# Altium PCB Acoustics Board.PcbDoc (part 1 of 3)
Units mil, origin at the board's own origin, x right, y up, seen from the top; angles counter-clockwise.
Board outline 4100 x 5000 mil, 4 copper layers (Top Layer, Middle 1 Layer, Middle 2 Layer, Bottom Layer), stack 53.912 mil thick; 240 components, 165 nets, 793 pads, 573 vias.
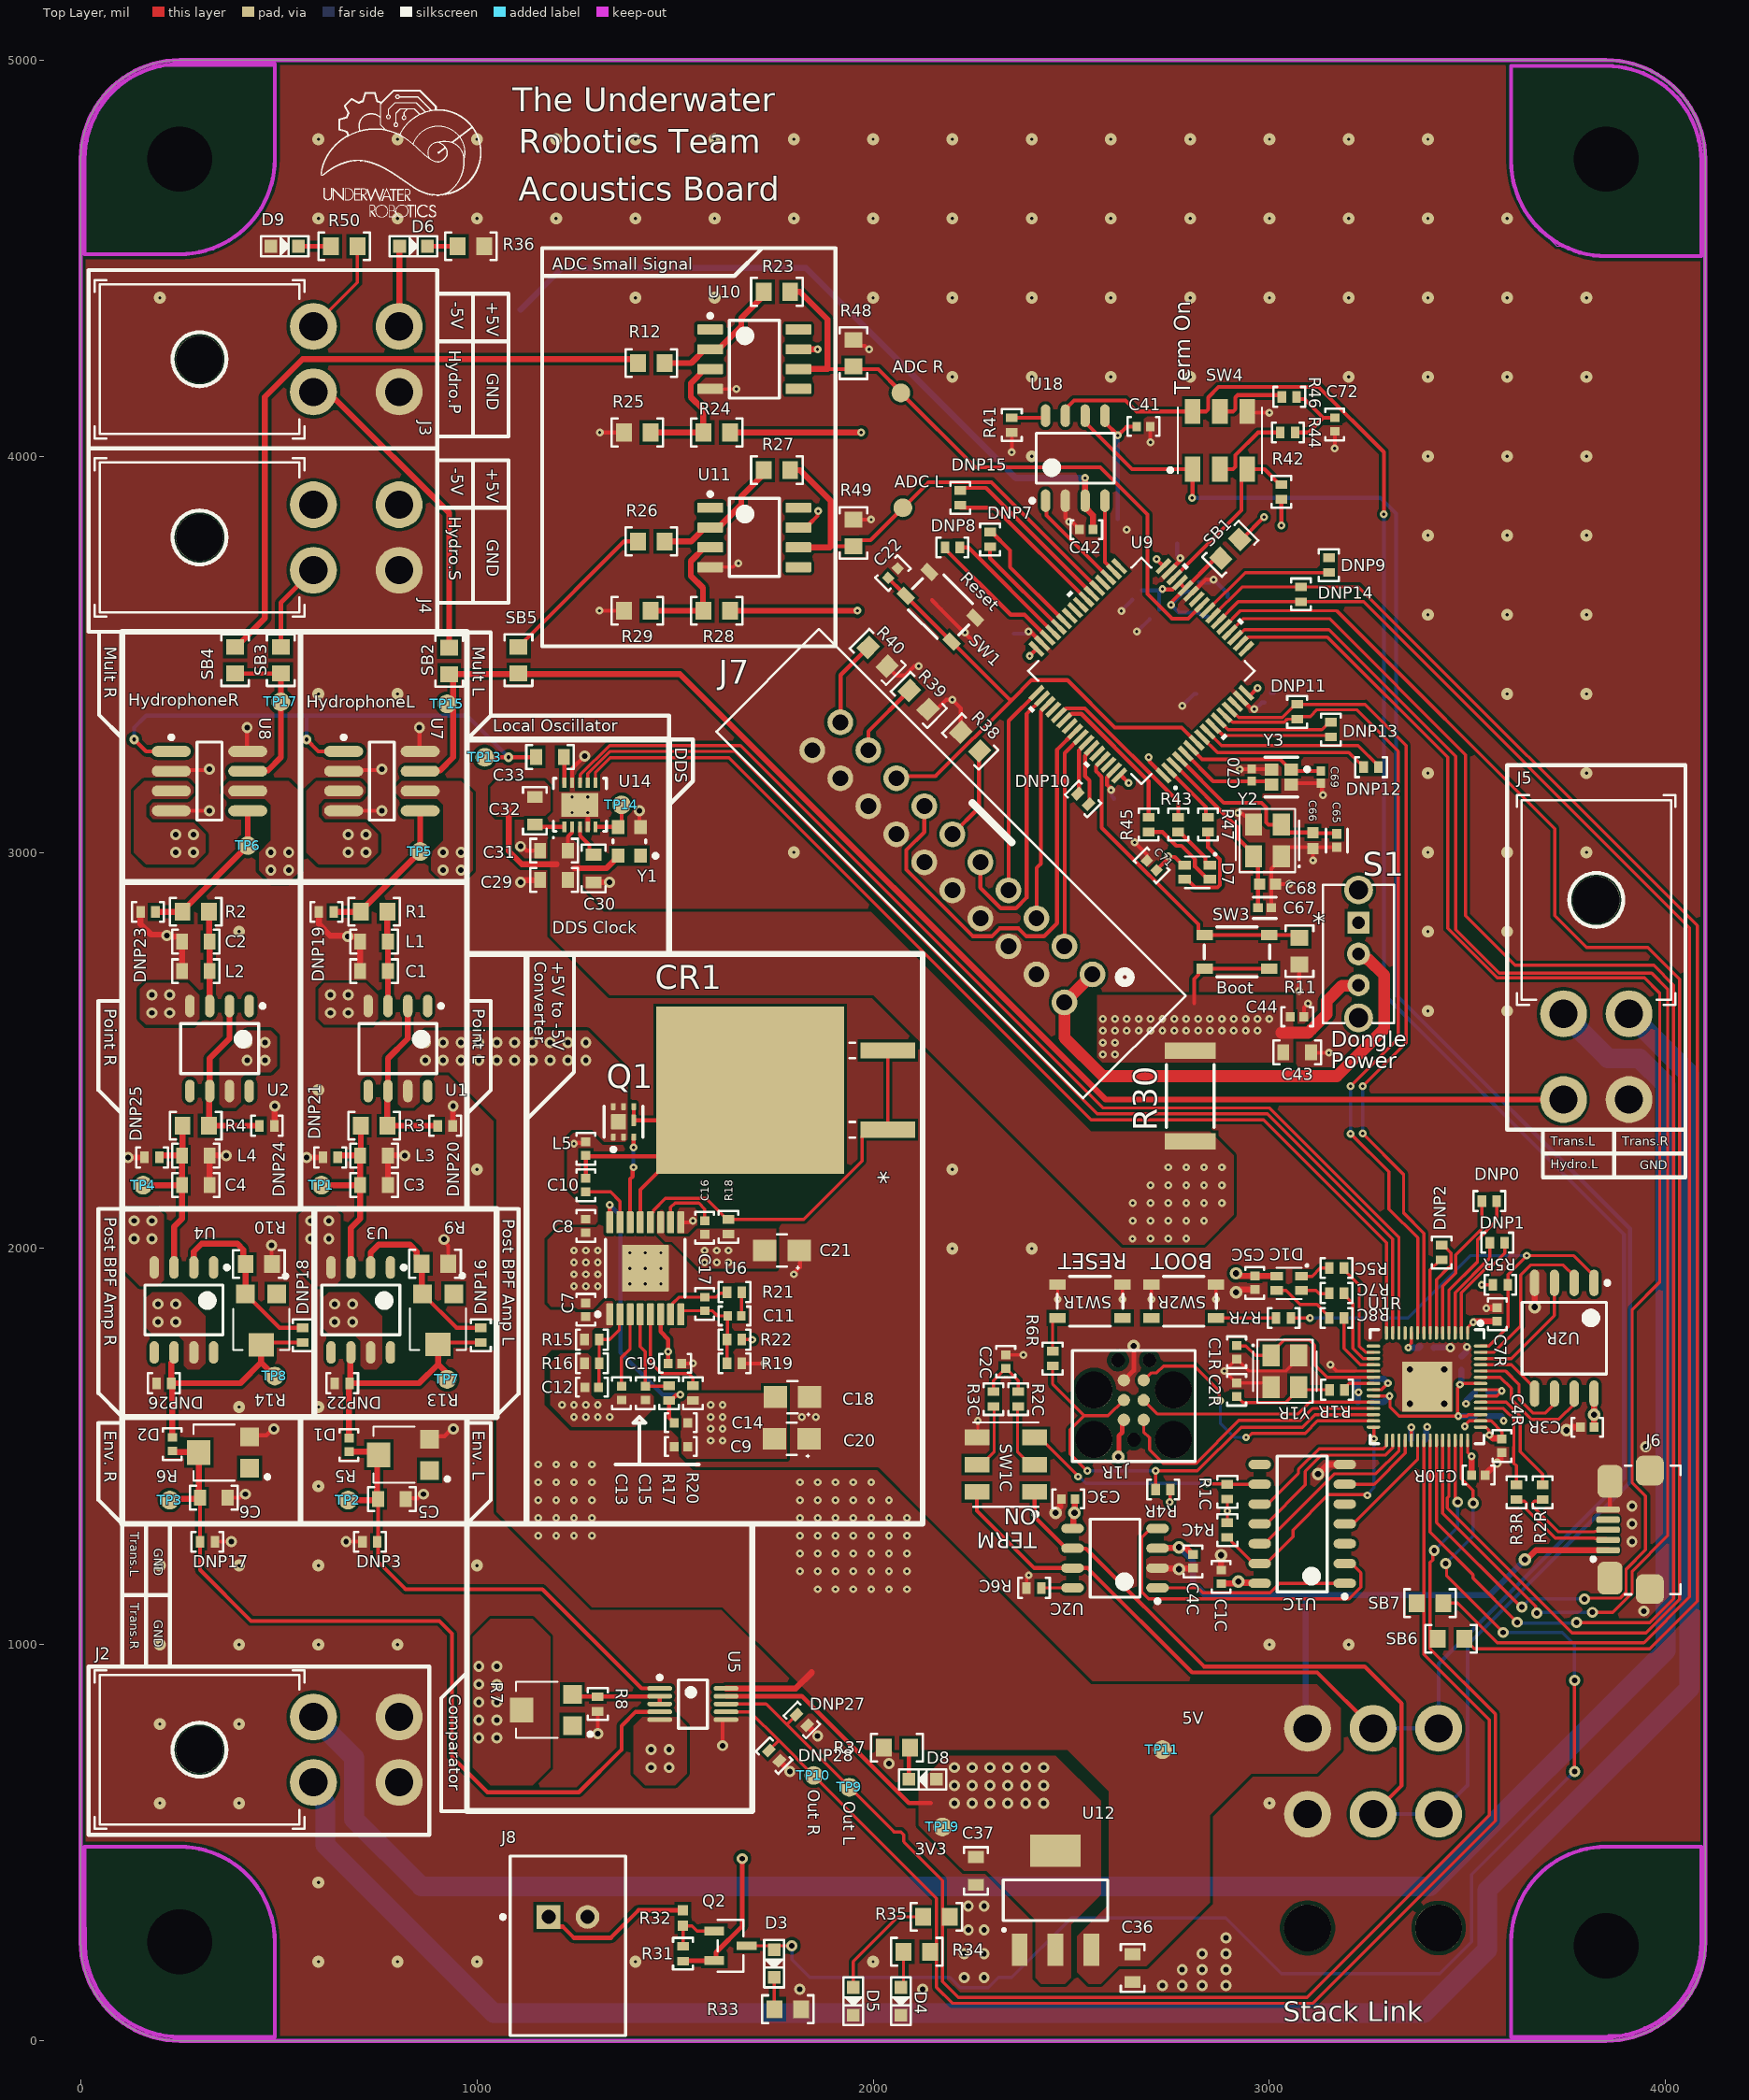
[diagram p0: Top Layer view]
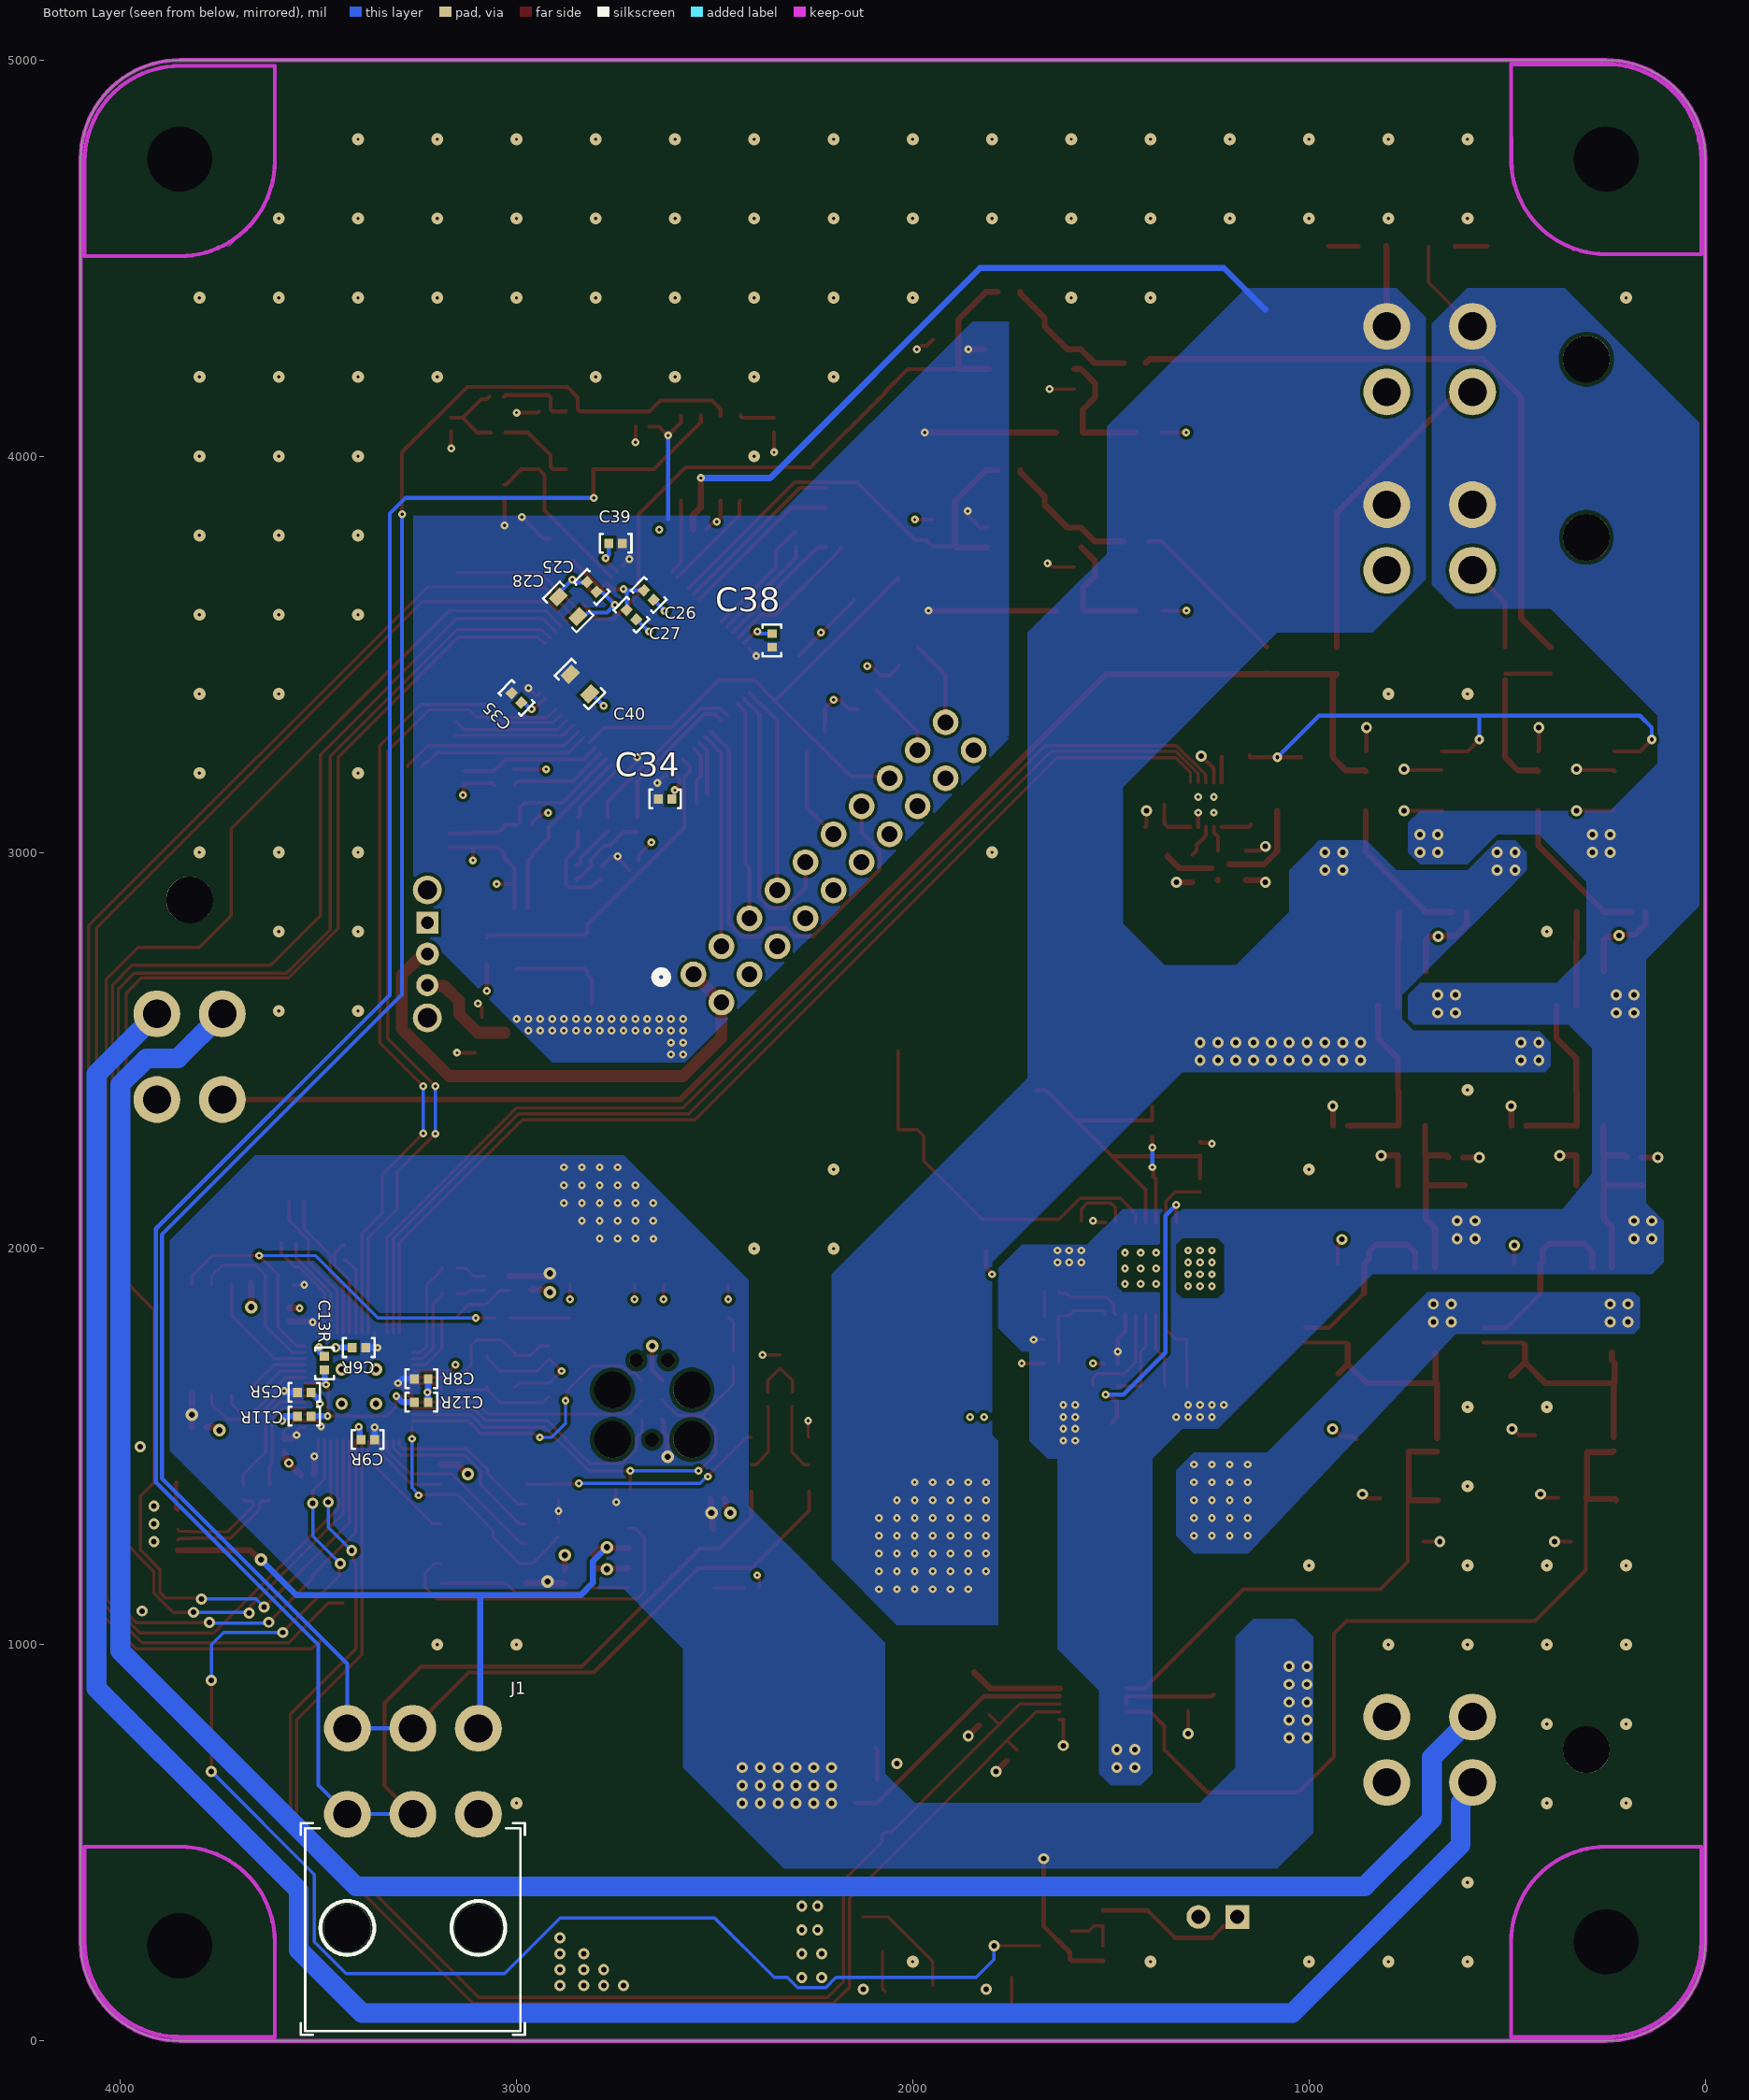
[diagram p1: Bottom Layer view, seen from below]
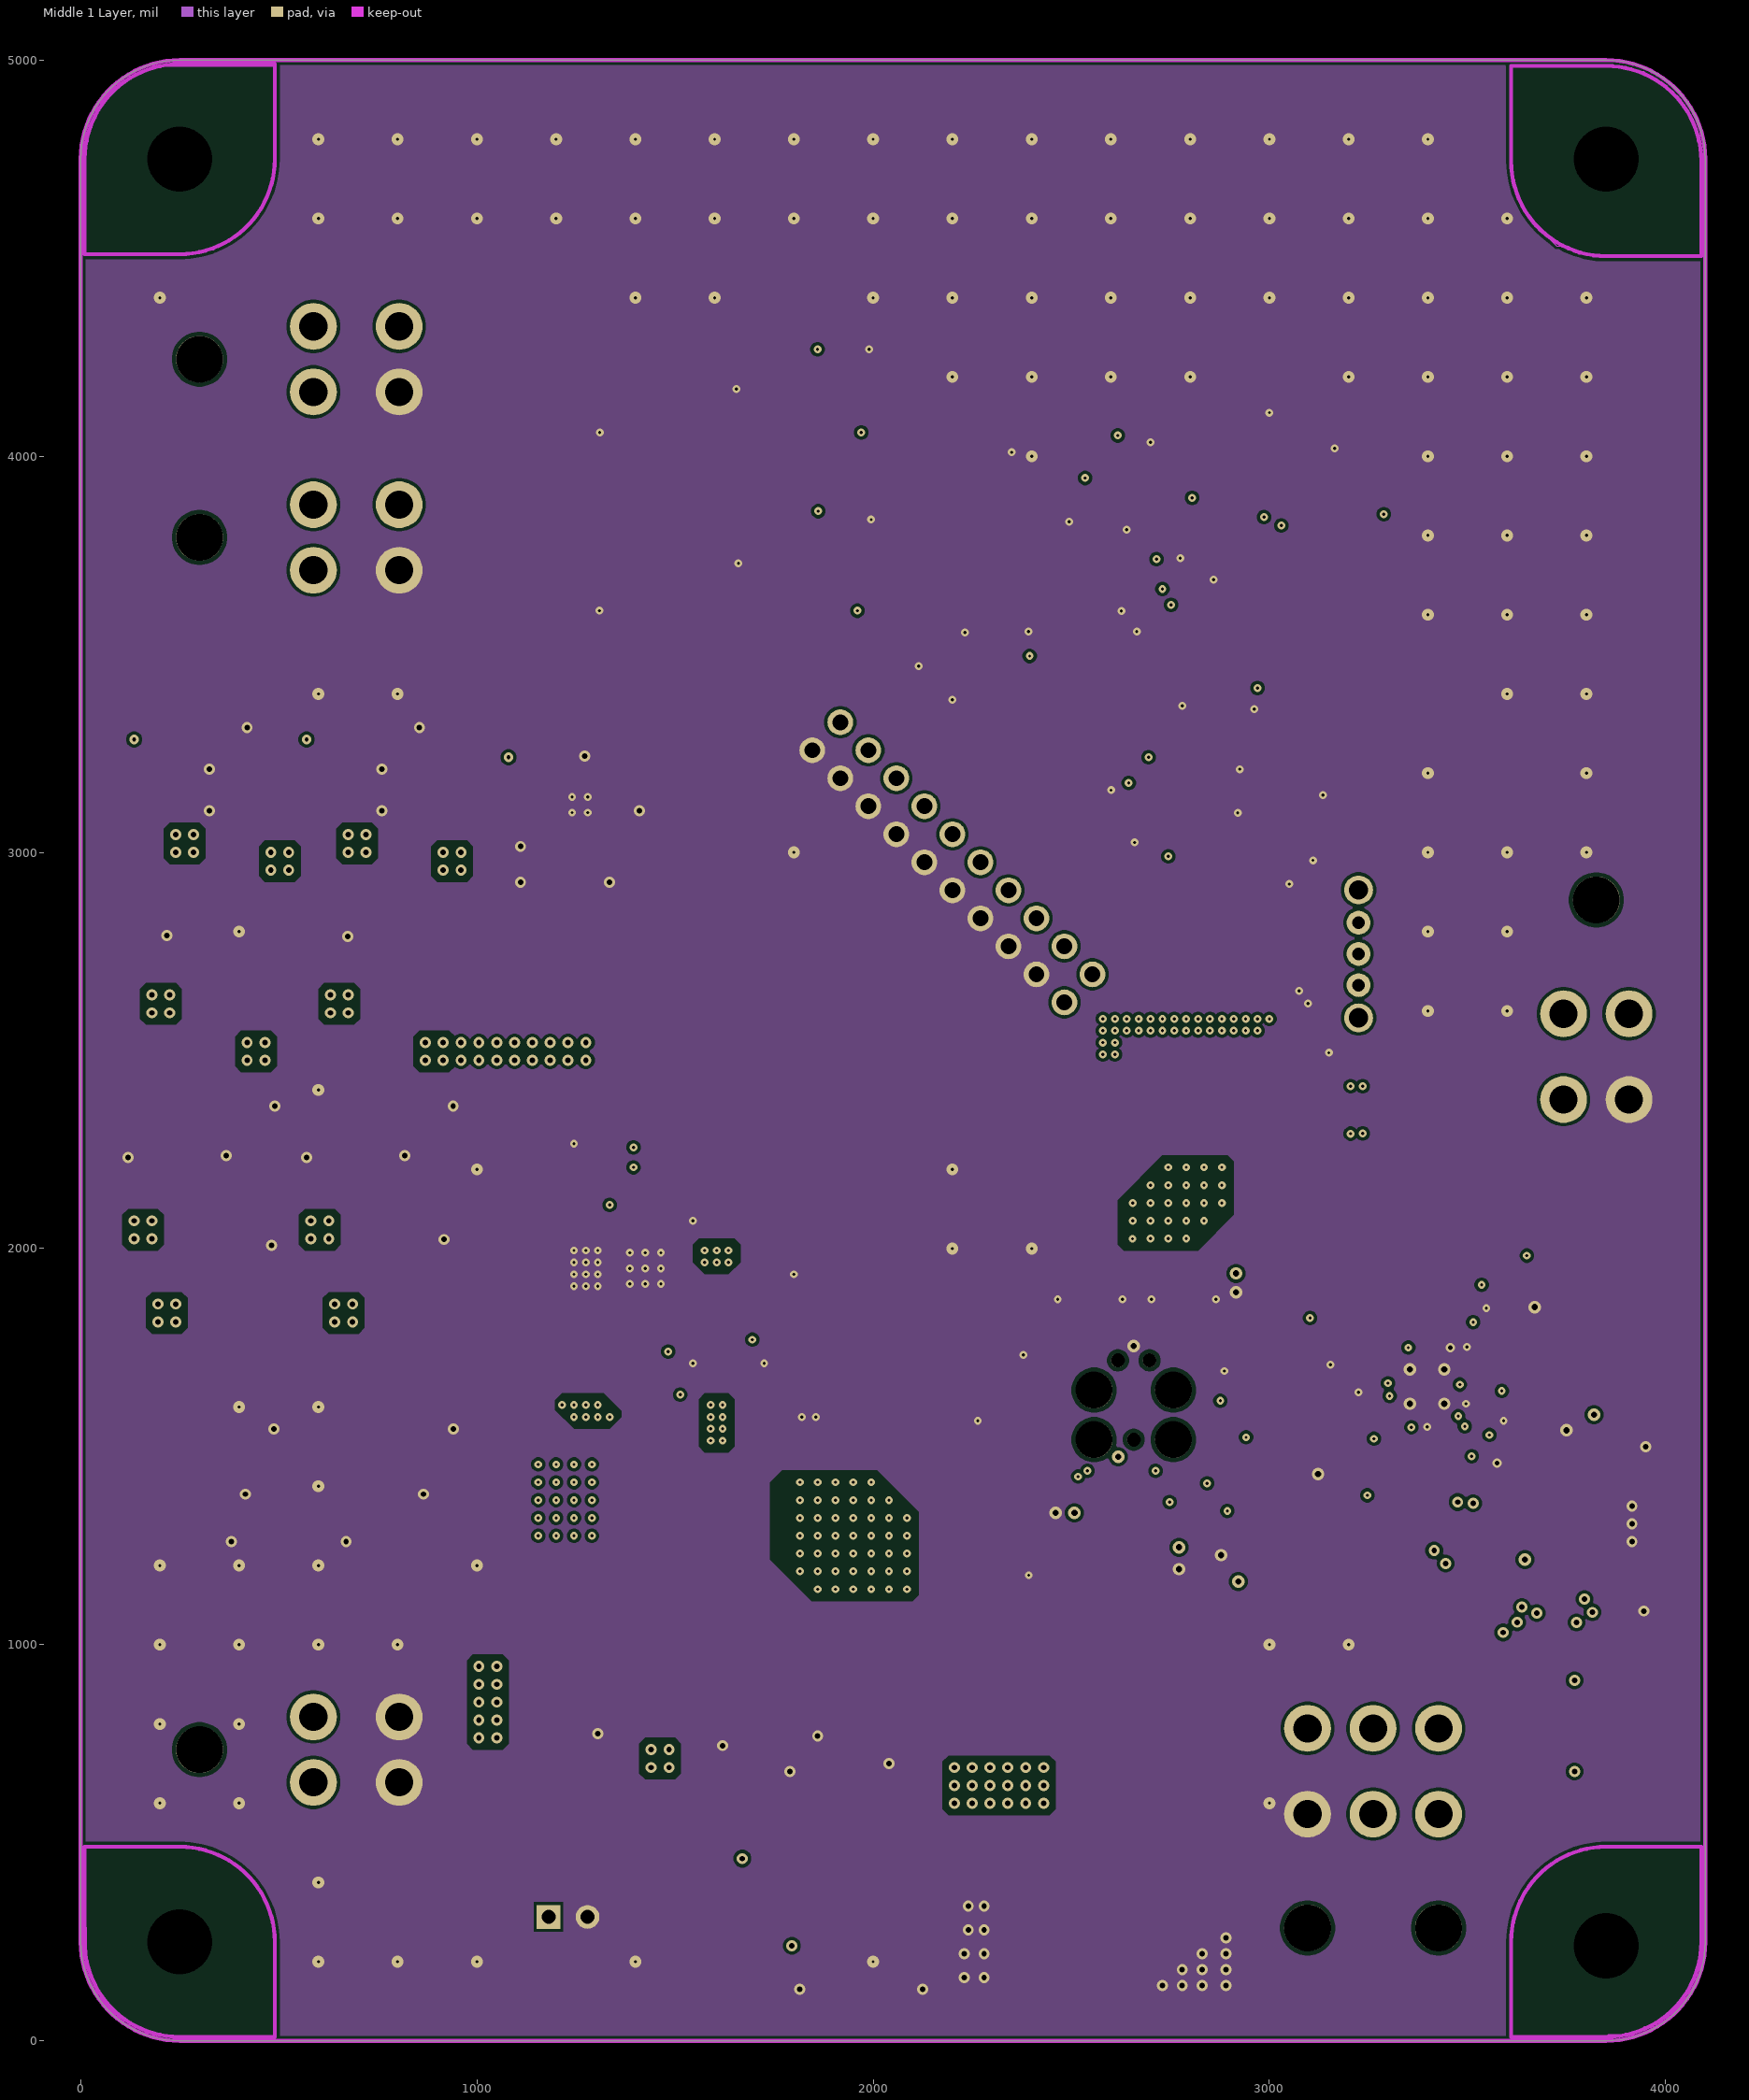
[diagram p2: Middle 1 Layer]
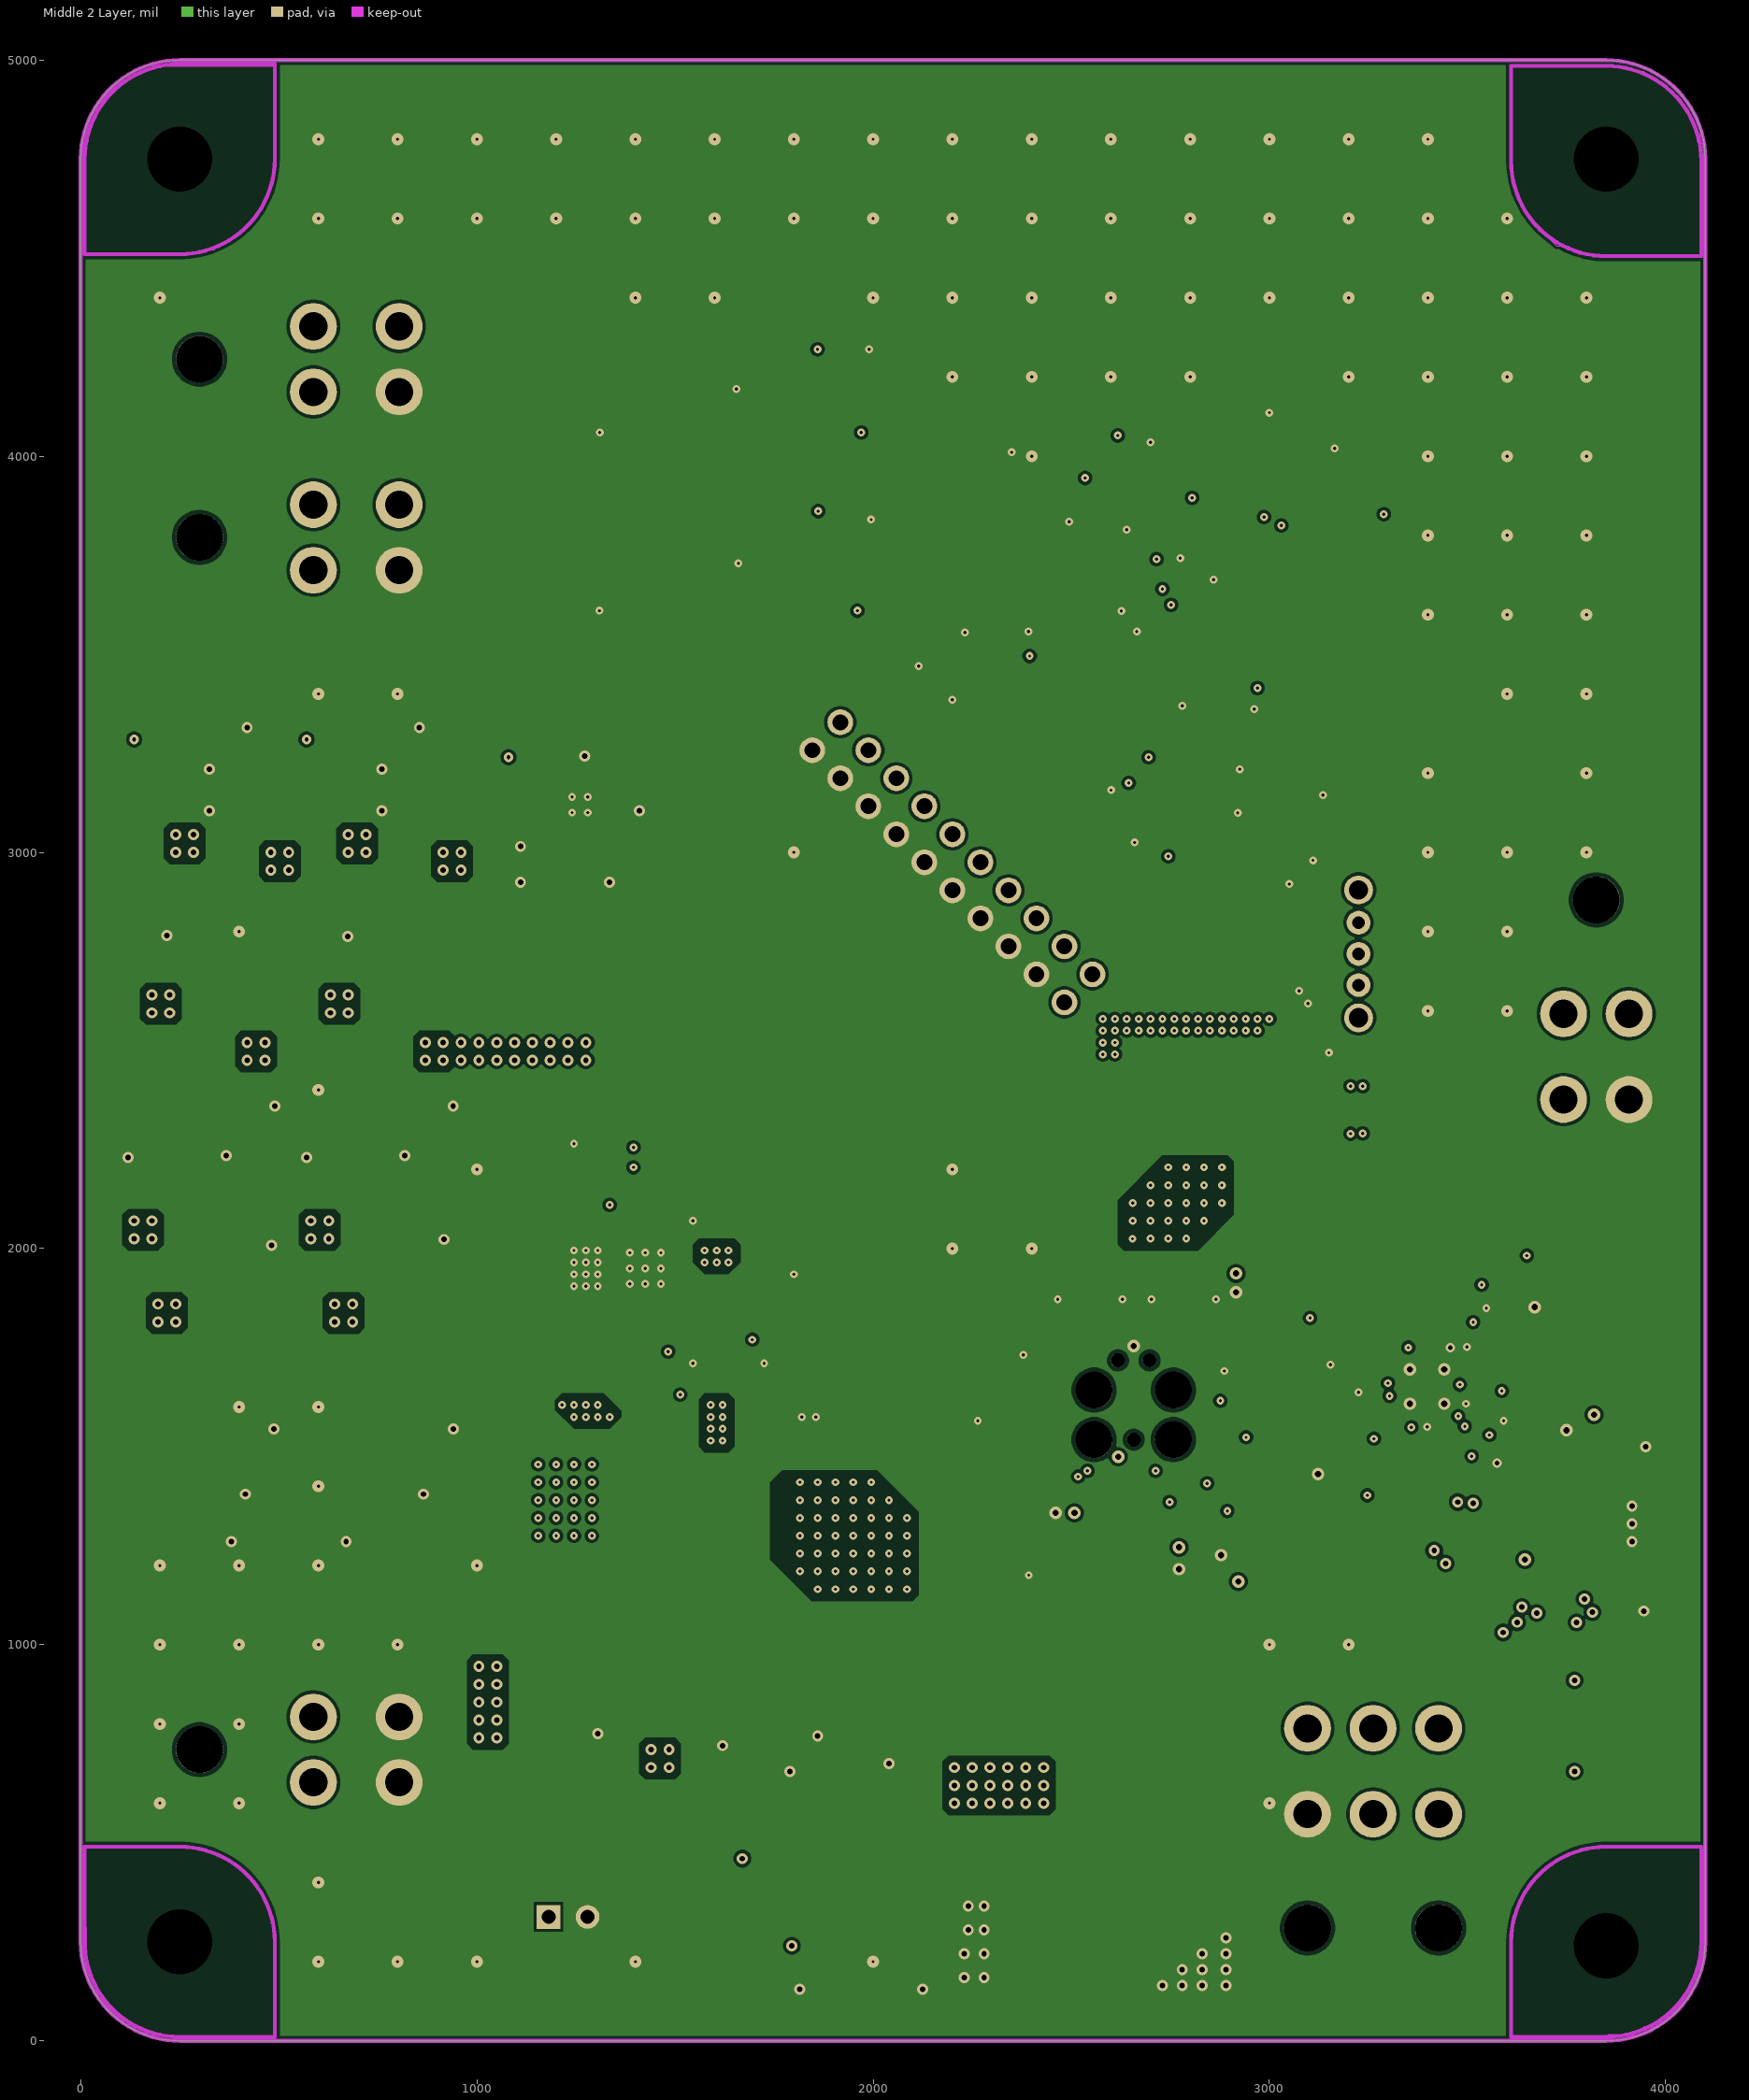
[diagram p3: Middle 2 Layer]
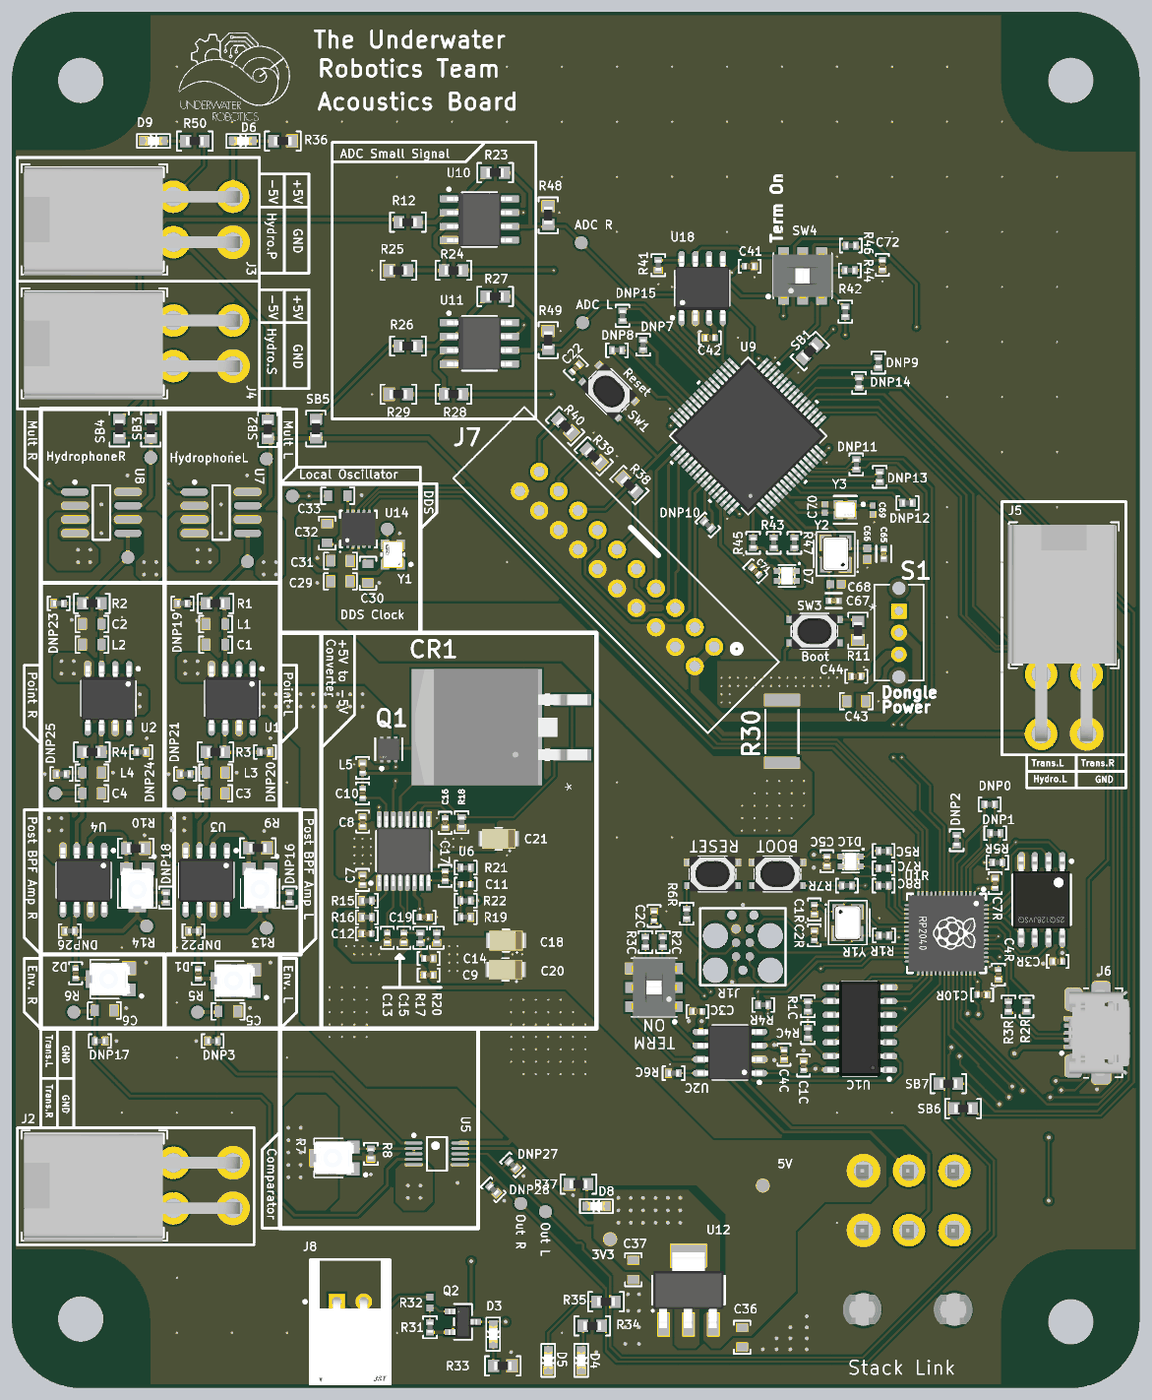
[diagram p6: 3D render of the assembled board from above, using the file's embedded part models]
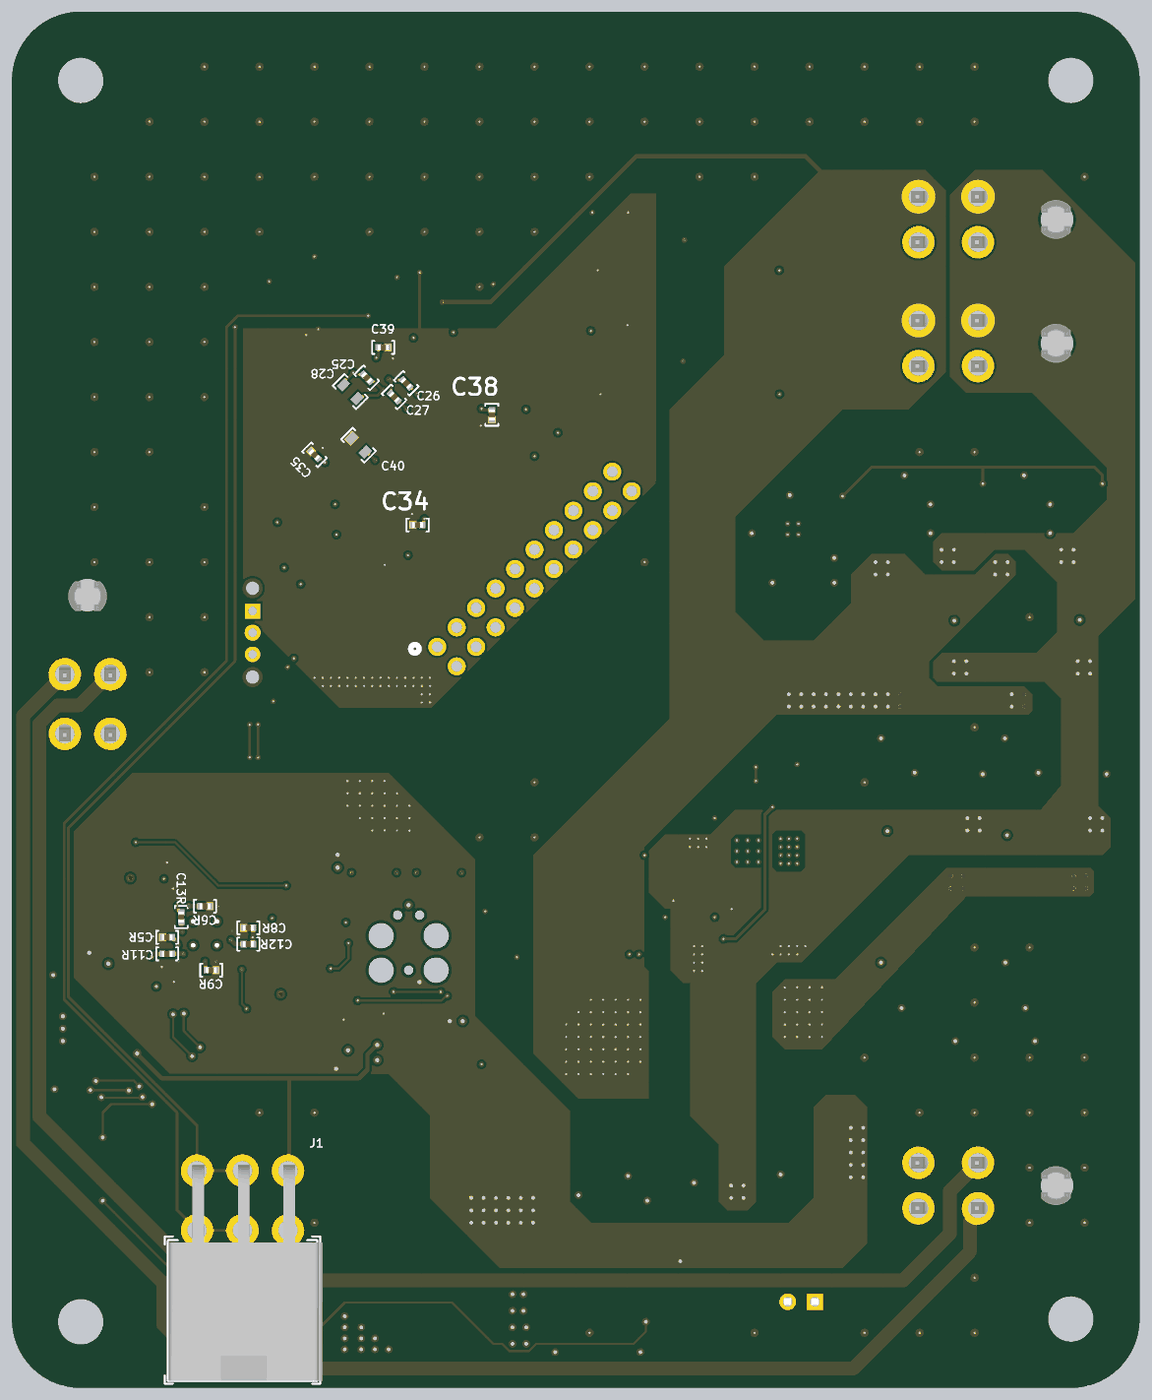
[diagram p7: 3D render of the assembled board from below, using the file's embedded part models]

## Layer stack, top to bottom
Top Solder: solder mask 1, SM-001, Dk 4
Top Layer: signal copper 1.378
Dielectric 1: prepreg 5.1, PP-017, Dk 4.3
Dielectric 2: prepreg 5.1, PP-017, Dk 4.3
Middle 1 Layer: signal copper 1.378
Dielectric 3: core 28, Core-039, Dk 4.8
Middle 2 Layer: signal copper 1.378
Dielectric 4: prepreg 5.1, PP-017, Dk 4.3
Dielectric 5: prepreg 5.1, PP-017, Dk 4.3
Bottom Layer: signal copper 1.378
Bottom Solder: solder mask 1, SM-001, Dk 4

## Board outline
250,0 cw(c250,250) 0,250 0,4750 cw(c250,4750) 250,5000 3850,5000 cw(c3850,4750) 4100,4750 4100,250 cw(c3850,250) 3850,0

## Design rules (kind name [scope] priority, off if disabled: settings)
AcuteAngle [All] p1: minimum=6.00000000000000E+0001 checktracksonly=FALSE
BoardOutlineClearance "BoardOutlineClearance JLCPCB" [All] p1: gap=7.87 ignorepadtopadclearanceinfootprint=FALSE
Clearance "Clearance JLCPCB 4 layer" [All] p1: gap=7.87 ignorepadtopadclearanceinfootprint=FALSE except(3.54: Arc-Arc Arc-Track Track-Track; 5: Arc-SMDPad Track-SMDPad SMDPad-SMDPad; 10: Arc-Hole Track-Hole SMDPad-Hole THPad-Hole Via-Hole Fill-Hole Poly-Hole Region-Hole Text-Hole)
DiffPairsRouting [All] p1: maxlimit=10 minlimit=6 mostfreqgap=8 toplayer_minwidth=3.54 toplayer_maxwidth=15 toplayer_prefwidth=8 midlayer1_minwidth=3.54 midlayer1_maxwidth=15 midlayer1_prefwidth=8 midlayer2_minwidth=3.54 midlayer2_maxwidth=15 midlayer2_prefwidth=8 bottomlayer_minwidth=3.54 bottomlayer_maxwidth=15 bottomlayer_prefwidth=8 maxuncoupledlength=500
HoleSize "HoleSize JLCPCB Pad" [IsPad] p1: absolutevalues=TRUE maxlimit=248.03 minlimit=19.68 maxpercent=80.000 minpercent=20.000
HoleSize "HoleSize JLCPCB 4 layer" [All] p2: absolutevalues=TRUE maxlimit=248.03 minlimit=7.87 maxpercent=80.000 minpercent=20.000
HoleToHoleClearance "HoleToHoleClearance JLCPCB" [All] p1: gap=10 allowstackedmicrovias=TRUE
MinimumAnnularRing "MinimumAnnularRing JLCPCB Pad" [IsPad] p1: minimumring=11.81
MinimumAnnularRing "MinimumAnnularRing JLCPCB 1oz" [All] p2: minimumring=5.12
MinimumSolderMaskSliver [All] p1: minsoldermaskwidth=1
PlaneConnect [All] p1: pad.planeconnectstyle=Relief pad.reliefexpansion=20 pad.reliefentries=4 pad.reliefconductorwidth=10 pad.reliefairgap=10 via.planeconnectstyle=Direct via.reliefexpansion=20 via.reliefentries=4 via.reliefconductorwidth=10 via.reliefairgap=10
PolygonConnect [All] p1: connectstyle=Direct reliefconductorwidth=15 reliefentries=4 polygonreliefangle="45 Angle" airgapwidth=10
RoutingVias "RoutingVias JLCPCB 4 layer" [All] p1: holewidth=19.68 width=39.37 viastyle="Through Hole" minholewidth=7.87 minwidth=15.75 maxholewidth=50 maxwidth=80
SilkToSilkClearance [All] p1: silktosilkclearance=3
SilkToSolderMaskClearance "SilkToSolderMaskClearance JLCPCB" [IsPad] p1: minsilkscreentomaskgap=5.91 clearancetoexposedcopper=TRUE
SolderMaskExpansion "SolderMaskExpansion JLCPCB" [All] p1: expansion=1.97 istentingtop=FALSE
SupplyNets "Schematic Supply Nets_6" [InNet('3V3_STM32')] p1: voltage=0.000
SupplyNets "Schematic Supply Nets_5" [InNet('3V3')] p2: voltage=0.000
SupplyNets "Schematic Supply Nets_2" [InNet('GND')] p3: voltage=0.000
SupplyNets "Schematic Supply Nets_1" [InNet('-5V')] p4: voltage=0.000
SupplyNets "Schematic Supply Nets" [InNet('5V')] p5: voltage=0.000
Width "Width JLCPCB 4 layer" [All] p1: maxlimit=196.85 minlimit=3.54 preferedwidth=9.84 minimp=50.000000 maximp=50.000000 favimp=50.000000
23 further rules are at their usual default settings.

## Classes and differential pairs
differential pair class "USB 2.0": USB USB_RP2040
component class STM32: C22 C25 C26 C27 C28 C34 C35 C38 C39 C40 C41 C42 C43 C44 C65 C66 C67 C68 C69 C70 C71 C72 D7 DNP7 DNP8 DNP9 DNP10 DNP11 DNP12 DNP13 DNP14 DNP15 J7 R11 R30 R38 R39 R40 R41 R42 R43 R44 R45 R46 R47 S1 SB1 SW1 SW3 SW4 U9 U18 Y2 Y3
component class "Process Sheet": C1 C2 C3 C4 C5 C6 D1 D2 DNP3 DNP16 DNP17 DNP18 DNP19 DNP20 DNP21 DNP22 DNP23 DNP24 DNP25 DNP26 DNP27 DNP28 L1 L2 L3 L4 R1 R2 R3 R4 R5 R6 R7 R8 R9 R10 R13 R14 TP1 TP2 TP3 TP4 TP5 TP6 TP7 TP8 TP9 TP10 U1 U2 U3 U4 U5 U7 U8
component class "Power Sheet": C7 C8 C9 C10 C11 C12 C13 C14 C15 C16 C17 C18 C19 C20 C21 C36 C37 CR1 D6 D8 D9 L5 Q1 R15 R16 R17 R18 R19 R20 R21 R22 R36 R37 R50 TP11 TP19 U6 U12
component class U_RP2040_C: C1R C2R C3R C4R C5R C6R C7R C8R C9R C10R C11R C12R C13R J1R R1R R2R R3R R4R R5R R6R R7R SW1R SW2R U1R U2R Y1R
component class U_RP2040_with_CAN: C1C C2C C3C C4C C5C D1C R1C R2C R3C R4C R5C R6C R7C R8C SW1C U1C U2C
component class "[Acoustics] Connections & RP2040": "ADC L" "ADC R" C29 C30 C31 C32 C33 D3 D4 D5 DNP0 DNP1 DNP2 J1 J2 J3 J4 J5 J6 J8 Q2 R12 R23 R24 R25 R26 R27 R28 R29 R31 R32 R33 R34 R35 R48 R49 SB2 SB3 SB4 SB5 SB6 SB7 TP13 TP14 TP15 TP17 U10 U11 U14 Y1
differential pair USB: +USB_P -USB_N
differential pair USB_RP2040: +USB_RP2040_P -USB_RP2040_N

## Components (designator, comment, footprint, x,y, rotation, side; value= is the part's Value field where it differs from the comment)
"ADC L" "PCB Test Point" TESTPOINT_1.2MM 2075,3870 r0 top
"ADC R" "PCB Test Point" TESTPOINT_1.2MM 2070,4160 r0 top
C1 "27pF Ceramic 50V" CAPACITOR_0603 740.63,2700 r180 top value=27pF
C1C "100nF Ceramic 25V" CAPACITOR_0402 2878.15,1171.14 r90 top value=0.1uF
C1R "27pF Ceramic 50V" CAPACITOR_0402 2917.52,1738.07 r270 top value=27pF
C2 "27pF Ceramic 50V" CAPACITOR_0603 290.63,2775 r180 top value=27pF
C2C "4700pF Ceramic 25V" CAPACITOR_0402 2334.84,1714.45 r270 top value=4.7nF
C2R "27pF Ceramic 50V" CAPACITOR_0402 2917.52,1643.58 r90 top value=27pF
C3 "27pF Ceramic 50V" CAPACITOR_0603 740.63,2160 r0 top value=27pF
C3C "100nF Ceramic 25V" CAPACITOR_0402 2492.32,1367.99 r180 top value=0.1uF
C3R "100nF Ceramic 6.3V" CAPACITOR_0402 3802.17,1549.09 r180 top value=0.1uF
C4 "27pF Ceramic 50V" CAPACITOR_0603 290.63,2160 r0 top value=27pF
C4C "100nF Ceramic 25V" CAPACITOR_0402 2807.28,1210.51 r270 top value=0.1uF
C4R "1uF Ceramic 16V" CAPACITOR_0402 3586.81,1501.85 r270 top value=1uF
C5 "10uF Ceramic 6.3V" CAPACITOR_0603 785.54,1368.07 r0 top
C5C "1uF Ceramic 16V" CAPACITOR_0402 2963.11,1913.59 r270 top value=1uF
C5R "100nF Ceramic 6.3V" CAPACITOR_0402 3535.63,1636.95 r180 bottom value=0.1uF
C6 "10uF Ceramic 6.3V" CAPACITOR_0603 336.08,1371.25 r0 top
C6R "100nF Ceramic 6.3V" CAPACITOR_0402 3397.83,1749.88 r0 bottom value=0.1uF
C7 "1uF Ceramic 16V" CAPACITOR_0402 1274.91,1845.5 r90 top value="2.2 uF"
C7R "100nF Ceramic 6.3V" CAPACITOR_0402 3575,1833.8 r90 top value=0.1uF
C8 "1uF Ceramic 16V" CAPACITOR_0402 1275,2057.13 r270 top value="100 nF"
C8R "100nF Ceramic 6.3V" CAPACITOR_0402 3240.35,1671.25 r180 bottom value=0.1uF
C9 "1uF Ceramic 16V" CAPACITOR_0402 1515,1500 r0 top value=2.2uF
C9R "100nF Ceramic 6.3V" CAPACITOR_0402 3375.59,1517.6 r0 bottom value=0.1uF
C10 "1uF Ceramic 16V" CAPACITOR_0402 1275,2160 r270 top value=100nF
C10R "100nF Ceramic 6.3V" CAPACITOR_0402 3527.76,1428.29 r0 top value=0.1uF
C11 "1uF Ceramic 16V" CAPACITOR_0402 1650,1830 r0 top value=1.2nF
C11R "1uF Ceramic 16V" CAPACITOR_0402 3535.63,1576.65 r0 bottom value=1uF
C12 "1uF Ceramic 16V" CAPACITOR_0402 1290,1650 r180 top value="56 nF"
C12R "100nF Ceramic 6.3V" CAPACITOR_0402 3240.35,1612.09 r180 bottom value=0.1uF
C13 "1uF Ceramic 16V" CAPACITOR_0402 1365,1635 r270 top value=33nF
C13R "100nF Ceramic 6.3V" CAPACITOR_0402 3484.45,1710.51 r90 bottom value=0.1uF
C14 "1uF Ceramic 16V" CAPACITOR_0402 1515,1560 r0 top value=1uF
C15 "1uF Ceramic 16V" CAPACITOR_0402 1425,1635 r270 top value=110pF
C16 "1uF Ceramic 16V" CAPACITOR_0402 1575,2052.87 r270 top value=22nF
C17 "1uF Ceramic 16V" CAPACITOR_0402 1575,1860 r90 top value=82pF
C18 "10uF Tantalum 16V" "CAPACITOR_1206 - POLAR" 1796.48,1625 r180 top
C19 "1uF Ceramic 16V" CAPACITOR_0402 1500,1710 r180 top value=4.7uF
C20 "10uF Tantalum 16V" "CAPACITOR_1206 - POLAR" 1795,1520 r180 top
C21 "10uF Tantalum 16V" "CAPACITOR_1206 - POLAR" 1770,1995 r180 top
C22 "100nF Ceramic 25V" CAPACITOR_0402 2050,3705 r45 top value=0.1uF
C25 "1uF Ceramic 16V" CAPACITOR_0402 2810,3670 r45 bottom value=1uF
C26 "100nF Ceramic 25V" CAPACITOR_0402 2666.27,3649.68 r225 bottom value=0.1uF
C27 "1uF Ceramic 16V" CAPACITOR_0402 2710,3600 r225 bottom value=1uF
C28 "10nF Ceramic 6.3V" CAPACITOR_0603 2869.75,3619.75 r45 bottom value=0.01uF
C29 "100nF Ceramic 6.3V" CAPACITOR_0603 1194.49,2930.09 r0 top value=0.1uF
C30 "100nF Ceramic 6.3V" CAPACITOR_0603 1294.68,2959.29 r90 top value=0.1uF
C31 "10uF Ceramic 6.3V" CAPACITOR_0603 1194.68,3004.29 r180 top
C32 "CL10B103KB8NNNC" CAPACITOR_0603 1146.42,3105.12 r270 top value=0.01uF
C33 "10uF Ceramic 6.3V" CAPACITOR_0603 1184.67,3241.2 r180 top
C34 "100nF Ceramic 25V" CAPACITOR_0402 2625,3135 r180 bottom value=0.1uF
C35 "100nF Ceramic 25V" CAPACITOR_0402 3000,3390 r225 bottom value=0.1uF
C36 "10uF Ceramic 6.3V" CAPACITOR_0603 2655,183.82 r270 top
C37 "10uF Ceramic 6.3V" CAPACITOR_0603 2259.32,428.86 r270 top
C38 "100nF Ceramic 25V" CAPACITOR_0402 2355,3535 r90 bottom value=0.1uF
C39 "100nF Ceramic 25V" CAPACITOR_0402 2750,3780 r0 bottom value=0.1uF
C40 "4.7uF Ceramic 6.3V" CAPACITOR_0603 2840,3425 r225 bottom value=4.7uF
C41 "100nF Ceramic 25V" CAPACITOR_0402 2682.13,4075 r0 top value=0.1uF
C42 "100nF Ceramic 25V" CAPACITOR_0402 2537.87,3815 r180 top value=0.1uF
C43 "4.7uF Ceramic 6.3V" CAPACITOR_0603 3070,2495 r0 top value=4.7uF
C44 "1uF Ceramic 16V" CAPACITOR_0402 3070,2585 r0 top value=1uF
C65 "GCM1555C1H110FA16D" FP-GCM155-0_05-IPC_B 3170,3030 r270 top value=11p
C66 "CC0402JRNPO9BN100" CAPC1005X55X25ML05T05 3110,3030 r90 top
C67 "GCM1555C1H110FA16D" FP-GCM155-0_05-IPC_B 2988.13,2860 r0 top value=11p
C68 "CC0402JRNPO9BN100" CAPC1005X55X25ML05T05 2994.92,2920 r180 top
C69 "04025A7R0CAT2A" CAPC1005X56X25LL10T15 3130.31,3190 r90 top value=7pF
C70 "04025A7R0CAT2A" CAPC1005X56X25LL10T15 2955.32,3195 r270 top value=7pF
C71 "1uF Ceramic 16V" CAPACITOR_0402 2702.89,2967.11 r135 top value=1uF
C72 "4700pF Ceramic 25V" CAPACITOR_0402 3165,4080 r90 top value=4.7nF
CR1 "VS-50WQ04FN-M3" D2PAK_VIS 1690,2400 r90 top
D1 "BAR9002ELE6327XTMA1" DIODE_0402 677.31,1504.09 r270 top
D1C "EAST1616RGBB4" LED_0606_4SMD 3049.73,1912.21 r180 top
D2 "BAR9002ELE6327XTMA1" DIODE_0402 231.55,1506.36 r270 top
D3 "IN-S63AT5G" LED_0603 1750,195 r270 top
D4 "IN-S63AT5G" LED_0603 2070,100 r270 top
D5 "IN-S63AT5G" LED_0603 1950,100 r270 top
D6 "IN-S63AT5G" LED_0603 840,4530 r0 top
D7 "EAST1616RGBB4" LED_0606_4SMD 2817.93,2950 r180 top
D8 "IN-S63AT5G" LED_0603 2125,660 r180 top
D9 "IN-S63AT5G" LED_0603 515,4530 r0 top
DNP0 "DNP" RESISTOR_0402 3555,2120 r180 top
DNP1 "DNP" RESISTOR_0402 3575,2015 r180 top
DNP2 "DNP" RESISTOR_0402 3435,1990 r90 top
DNP3 "DNP" RESISTOR_0402 730,1260 r0 top
DNP7 "DNP" RESISTOR_0402 2295,3790 r270 top
DNP8 "DNP" RESISTOR_0402 2200,3770 r180 top
DNP9 "DNP" RESISTOR_0402 3150,3725 r90 top
DNP10 "DNP" RESISTOR_0402 2530,3135 r315 top
DNP11 "DNP" RESISTOR_0402 3070,3355 r90 top
DNP12 "DNP" RESISTOR_0402 3256.3,3215 r180 top
DNP13 "DNP" RESISTOR_0402 3155,3310 r270 top
DNP14 "DNP" RESISTOR_0402 3080,3651.3 r270 top
DNP15 "DNP" RESISTOR_0402 2220,3895 r90 top
DNP16 "DNP" RESISTOR_0402 1010,1781.3 r90 top
DNP17 "DNP" RESISTOR_0402 320,1260 r180 top
DNP18 "DNP" RESISTOR_0402 560,1781.3 r90 top
DNP19 "DNP" RESISTOR_0402 620,2850 r180 top
DNP20 "DNP" RESISTOR_0402 920,2310 r0 top
DNP21 "DNP" RESISTOR_0402 630,2230 r180 top
DNP22 "DNP" RESISTOR_0402 660,1660 r180 top
DNP23 "DNP" RESISTOR_0402 170,2850 r180 top
DNP24 "DNP" RESISTOR_0402 470,2310 r0 top
DNP25 "DNP" RESISTOR_0402 180,2230 r180 top
DNP26 "DNP" RESISTOR_0402 210,1660 r180 top
DNP27 "DNP" RESISTOR_0402 1820,810 r315 top
DNP28 "DNP" RESISTOR_0402 1750,720 r315 top
J1 "Mini-Fit Jr R/A" "CONN_MOLEX_MINIFIT JR_6 POS_R/A" 3426.96,285 r180 bottom
J1R "TagConnect SWD" TC2030-MCP 2657.68,1517.6 r90 top locked
J2 "Mini-Fit Jr R/A" "CONN_MOLEX_MINIFIT JR_4 POS_R/A" 300,735 r270 top
J3 "Mini-Fit Jr R/A" "CONN_MOLEX_MINIFIT JR_4 POS_R/A" 300,4245 r270 top
J4 "Mini-Fit Jr R/A" "CONN_MOLEX_MINIFIT JR_4 POS_R/A" 300,3795 r270 top
J5 "Mini-Fit Jr R/A" "CONN_MOLEX_MINIFIT JR_4 POS_R/A" 3825,2880 r180 top
J6 "USB_MICRO R/A" CONN_MINIUSB 3960,1290 r90 top
J7 "CONN HEADER VERT 20POS 2.54MM" STM32_Connector 2200,2975 r135 top
J8 "S2B-XH-A-1(LF)(SN)" FP-S2B-XH-A-1_LF_SN-MFG 1230,240 r180 top
L1 "FIXED IND 12UH 10MA 1.8 OHM SMD" INDUCTOR_0603 740.63,2775 r180 top value=12uH
L2 "FIXED IND 12UH 10MA 1.8 OHM SMD" INDUCTOR_0603 290.63,2700 r180 top value=12uH
L3 "FIXED IND 12UH 10MA 1.8 OHM SMD" INDUCTOR_0603 740.63,2235 r0 top value=12uH
L4 "FIXED IND 12UH 10MA 1.8 OHM SMD" INDUCTOR_0603 290.63,2235 r0 top value=12uH
L5 "FIXED IND 15NH 250MA 600MOHM SMD" INDUCTOR_0402 1275,2252.13 r270 top value=2.2uH
Q1 "CSD15571Q2" FP-DQK0006C-MFG 1370,2320 r90 top
Q2 "MOSFET P-CHANNEL 20V 4.7A SOT23" SOT-23-3 1640,240 r270 top
R1 "1k Ohm 5% 1/8W" RESISTOR_0603 740.63,2850 r180 top
R1C "10k Ohm 1% 1/16W" RESISTOR_0402 2893.9,1386.3 r90 top
R1R "1k Ohm 1% 1/16W" RESISTOR_0402 3170.55,1643.58 r180 top
R2 "1k Ohm 5% 1/8W" RESISTOR_0603 290.63,2850 r180 top
R2C "60.4 Ohm 1% 1/16W" RESISTOR_0402 2366.34,1619.96 r90 top
R2R "27 Ohm 1% 1/16W" RESISTOR_0402 3689.33,1385.08 r90 top
R3 "1k Ohm 5% 1/8W" RESISTOR_0603 740.63,2310 r0 top
R3C "60.4 Ohm 1% 1/16W" RESISTOR_0402 2303.35,1619.96 r90 top
R3R "27 Ohm 1% 1/16W" RESISTOR_0402 3623.32,1385.08 r90 top
R4 "1k Ohm 5% 1/8W" RESISTOR_0603 290.63,2310 r0 top
R4C "10k Ohm 1% 1/16W" RESISTOR_0402 2893.9,1289.25 r270 top
R4R "10k Ohm 1% 1/16W" RESISTOR_0402 2731.5,1391.61 r180 top
R5 "TC33X-2-203E" TRIM_TC33X-2-203E 809.45,1479.37 r180 top
R5C "604 Ohm 1% 1/16W" RESISTOR_0402 3169.49,1950.67 r180 top
R5R "10k Ohm 1% 1/16W" RESISTOR_0402 3582.87,1908.6 r0 top
R6 "TC33X-2-203E" TRIM_TC33X-2-203E 355.31,1485 r180 top
R6C "10k Ohm 1% 1/16W" RESISTOR_0402 2405.71,1143.39 r180 top
R6R "1k Ohm 1% 1/16W" RESISTOR_0402 2452.95,1722.32 r270 top
R7 "TC33X-2-203E" TRIM_TC33X-2-203E 1170,835.31 r180 top
R7C "200 Ohm 1% 1/16W" RESISTOR_0402 3169.49,1887.68 r180 top
R7R "1k Ohm 1% 1/16W" RESISTOR_0402 3035.63,1824.68 r0 top
R8 "1k Ohm 1% 1/16W" RESISTOR_0402 1305,850.31 r270 top
R8C "200 Ohm 1% 1/16W" RESISTOR_0402 3169.49,1824.68 r180 top
R9 "10k Ohm 0.5% 1/10W" RESISTOR_0603 894.46,1961.49 r0 top
R10 "10k Ohm 0.5% 1/10W" RESISTOR_0603 449.79,1960.63 r0 top
R11 "10k Ohm 5% 1/10W" RESISTOR_0603 3076,2751 r270 top
R12 "10k Ohm 5% 1/10W" RESISTOR_0603 1440,4235 r0 top
R13 "TC33X-2-103E" TRIM_TC33X-2-203E 901.94,1815 r270 top
R14 "TC33X-2-103E" TRIM_TC33X-2-203E 455.63,1814.37 r270 top
R15 "1k Ohm 1% 1/16W" RESISTOR_0402 1290,1770 r0 top
R16 "1k Ohm 1% 1/16W" RESISTOR_0402 1290,1710 r180 top
R17 "1k Ohm 1% 1/16W" RESISTOR_0402 1485,1635 r90 top
R18 "1k Ohm 1% 1/16W" RESISTOR_0402 1635,2055 r270 top
R19 "1k Ohm 1% 1/16W" RESISTOR_0402 1650,1710 r180 top
R20 "1k Ohm 1% 1/16W" RESISTOR_0402 1545,1635 r90 top
R21 "1k Ohm 1% 1/16W" RESISTOR_0402 1650,1890 r180 top
R22 "1k Ohm 1% 1/16W" RESISTOR_0402 1650,1770 r0 top
R23 "1k Ohm 5% 1/8W" RESISTOR_0603 1757,4415 r180 top
R24 "100k Ohm 5% 1/8W" RESISTOR_0603 1605,4060 r0 top
R25 "100k Ohm 5% 1/8W" RESISTOR_0603 1405,4060 r180 top
R26 "10k Ohm 5% 1/10W" RESISTOR_0603 1440,3785 r0 top
R27 "1k Ohm 5% 1/8W" RESISTOR_0603 1757,3965 r180 top
R28 "100k Ohm 5% 1/8W" RESISTOR_0603 1605,3610 r0 top
R29 "100k Ohm 5% 1/8W" RESISTOR_0603 1405,3610 r180 top
R30 "Jumper 2512(6432)" RESC2512(6432)_L 2800,2385 r90 top value="0.00 Ohm"
R31 "1k Ohm 1% 1/16W" RESISTOR_0402 1520,220 r90 top
R32 "27K" RESC1005X40X25ML05T05 1520,310 r270 top
R33 "4.7k Ohm 5% 1/10W" RESISTOR_0603 1785,80 r0 top
R34 "4.7k Ohm 5% 1/10W" RESISTOR_0603 2110,225 r180 top
R35 "4.7k Ohm 5% 1/10W" RESISTOR_0603 2160,313.25 r180 top
R36 "4.7k Ohm 5% 1/10W" RESISTOR_0603 985,4530 r0 top
R37 "4.7k Ohm 5% 1/10W" RESISTOR_0603 2060,740 r180 top
R38 "10k Ohm 5% 1/10W" RESISTOR_0603 2245,3280 r315 top
R39 "10k Ohm 5% 1/10W" RESISTOR_0603 2115,3385 r135 top
R40 "10k Ohm 5% 1/10W" RESISTOR_0603 2011.31,3493.69 r135 top
R41 "10k Ohm 1% 1/16W" RESISTOR_0402 2350,4078.7 r270 top
R42 "10k Ohm 1% 1/16W" RESISTOR_0402 3030,3910 r90 top
R43 "604 Ohm 1% 1/16W" RESISTOR_0402 2770,3070 r270 top
R44 "60.4 Ohm 1% 1/16W" RESISTOR_0402 3046.3,4060 r0 top
R45 "200 Ohm 1% 1/16W" RESISTOR_0402 2695,3070 r270 top
R46 "60.4 Ohm 1% 1/16W" RESISTOR_0402 3050,4150 r0 top
R47 "200 Ohm 1% 1/16W" RESISTOR_0402 2845,3070 r270 top
R48 "27 Ohm 5% 1/8W" RESISTOR_0603 1950,4260 r90 top
R49 "27 Ohm 5% 1/8W" RESISTOR_0603 1950,3806.5 r90 top
R50 "4.7k Ohm 5% 1/10W" RESISTOR_0603 665,4530 r0 top
S1 "SS-12D07-VG 4 NS GA PA" "SS-12D07-VG 4 NS GA PA" 3225,2822.48 r0 top
SB1 "0 Ohm Jumper No Fit" RESISTOR_0603 2901.31,3766.31 r45 top
SB2 "0 Ohm Jumper No Fit" RESISTOR_0603 930,3483.5 r270 top
SB3 "0 Ohm Jumper No Fit" RESISTOR_0603 505,3485 r270 top
SB4 "0 Ohm Jumper No Fit" RESISTOR_0603 390,3485 r270 top
SB5 "0 Ohm Jumper No Fit" RESISTOR_0603 1105,3485 r270 top
SB6 "0 Ohm Jumper No Fit" RESISTOR_0603 3458.5,1015 r180 top
SB7 "0 Ohm Jumper No Fit" RESISTOR_0603 3405,1105 r180 top
SW1 "434123025826" SMD_434123025826 2170,3620 r135 top
SW1C "Switch DPDT" CAS-220TA 2334.84,1454.61 r90 top
SW1R "434123025826" SMD_434123025826 2547.44,1867.01 r180 top
SW2R "434123025826" SMD_434123025826 2783.66,1867.01 r180 top
SW3 "434123025826" SMD_434123025826 2918,2749 r0 top
SW4 "Switch DPDT" CAS-220TA 2875,4040 r0 top
TP1 "PCB Test Point" TESTPOINT_1.2MM 607.63,2160 r180 top
TP2 "PCB Test Point" TESTPOINT_1.2MM 675,1365 r0 top
TP3 "PCB Test Point" TESTPOINT_1.2MM 225,1365 r0 top
TP4 "PCB Test Point" TESTPOINT_1.2MM 157.63,2160 r180 top
TP5 "PCB Test Point" TESTPOINT_1.2MM 856.77,3002.14 r180 top
TP6 "PCB Test Point" TESTPOINT_1.2MM 421.77,3017.14 r180 top
TP7 "PCB Test Point" TESTPOINT_1.2MM 925,1670 r0 top
TP8 "PCB Test Point" TESTPOINT_1.2MM 489.91,1678 r0 top
TP9 "PCB Test Point" TESTPOINT_1.2MM 1940,640 r90 top
TP10 "PCB Test Point" TESTPOINT_1.2MM 1850,670 r180 top
TP11 "PCB Test Point" TESTPOINT_1.2MM 2730,735 r0 top
TP13 "PCB Test Point" TESTPOINT_1.2MM 1020,3240 r90 top
TP14 "PCB Test Point" TESTPOINT_1.2MM 1365,3120 r90 top
TP15 "PCB Test Point" TESTPOINT_1.2MM 925,3375 r270 top
TP17 "PCB Test Point" TESTPOINT_1.2MM 505,3380 r270 top
TP19 "PCB Test Point" TESTPOINT_1.2MM 2175,540 r90 top
U1 "LF356MX/NOPB" SOIC-8 800.63,2505 r270 top
U1C "MCP2517FD" SOIC-14 3082.87,1305 r180 top
U1R "RP2040" "QFN-56 RP2040" 3397.83,1651.46 r270 top
U2 "LF356MX/NOPB" SOIC-8 350.63,2505 r270 top
U2C "CAN Transceiver" SOIC-8 2610.43,1218.39 r180 top
U2R "W25Q128JVSIQ" "SOIC-8 W25QxJV" 3744.29,1773.56 r270 top
U3 "LF356MX/NOPB" SOIC-8 706.94,1845 r270 top
U4 "LF356MX/NOPB" SOIC-8 260.63,1845 r270 top
U5 "LT1715CMS#PBF" LT-MS10_N 1545,850.31 r0 top
U6 "LM25088MH-1/NOPB" PWP0016A_N 1425,1950 r90 top
U7 "AD633JRZ" ADI-R-8_M 760.31,3180 r0 top
U8 "AD633JRZ" ADI-R-8_M 325.31,3180 r0 top
U9 "STM32G474RCT6" LQFP64-10x10mm 2677.03,3458.11 r135 top
U10 "OPA228U" D0008A_M 1700,4245 r0 top
U11 "OPA228U" D0008A_M 1700,3795 r0 top
U12 "LM1117IMPX-3.3/NOPB" SOT-223-4 2460,355 r90 top
U14 "IC DDS 5MHZ 10BIT 10LFCSP" CP-10-9 1260,3120 r90 top
U18 "CAN Transceiver" SOIC-8 2510,3995 r90 top
Y1 "ECS-TXO-2520-33-250-AN-TR" FP-ECS-TXO-2520-MFG 1384.79,3027.78 r90 top
Y1R "CRYSTAL 12.0000MHZ 18PF SMD" "4-SMD, NO LEAD CRYSTAL 3.2x2.5mm" 3004.13,1730.2 r270 top
Y2 "XTAL OSC XO 32.7680KHZ 15 pF CMOS SMD" "4-SMD, NO LEAD CRYSTAL 3.2x2.5mm" 3030,2990 r90 top value=32.768
Y3 "ABM11W-24.0000MHZ-7-B1U-T3" FP-ABM11W-MFG 3030.32,3190 r180 top

## Footprints (in the part's own frame and the unit in brackets; to place one, negate y for a bottom-side part, rotate by r counter-clockwise, add the part's x,y. Pads: shape width x height; smd on the part's side, far side on the other; paste and mask are expansions set on the pad)
"4-SMD, NO LEAD CRYSTAL 3.2x2.5mm" [mm]
  rrect0% 1.4x1.1 smd: 1(0,0) 2(2.032,0) 3(2.032,1.778) 4(0,1.778)
  silkscreen extent -1.02,-1.2 3.05,2.92, body extent -0.58,-0.36 2.62,2.14, height 0.82
ADI-R-8_M [mm] "SOIC, 8-Leads, Body 5x4mm, Pitch 1.27mm, IPC Low Density"
  oval 2.5x0.7 smd: 1(-2.45,1.905) 2(-2.45,0.635) 3(-2.45,-0.635) 4(-2.45,-1.905) 5(2.45,-1.905) 6(2.45,-0.635) 7(2.45,0.635) 8(2.45,1.905)
  silkscreen extent -2.57,-2.5 0.8,2.93, body extent -2,-2.5 2,2.5, height 1.75
CAPACITOR_0402 [mm]
  rect 0.56x0.6 smd: 1(-0.435,0) 2(0.435,0)
  silkscreen extent -1.02,-0.6 1.02,0.6, body extent -0.5,-0.28 0.5,0.27, height 0.51
CAPACITOR_0603 [mil] "CAPACITOR 0603"
  rect 30x40 smd: 1(-35,0) 2(35,0)
  silkscreen extent -60,-30 60,30, body extent -31,-16 32,16, height 31
"CAPACITOR_1206 - POLAR" [mil]
  rect 58.96x55 smd paste+0 mask+0: 1(-43.52,0) 2(43.52,0)
  silkscreen extent -44,-40 12,47, body extent -67,-36 67,36, height 73
CAPC1005X55X25ML05T05 [mm] "Chip Capacitor, 2-Leads, Body 1.00x0.50mm, IPC Low Density"
  rect 0.72x0.72 smd: 1(-0.51,0) 2(0.51,0)
  body extent -0.53,-0.28 0.53,0.27, height 0.55
CAPC1005X56X25LL10T15 [mm] "Chip Capacitor, 2-Leads, Body 1.00x0.50mm, IPC High Density"
  rect 0.58x0.54 smd: 1(-0.39,0) 2(0.39,0)
  body extent -0.55,-0.3 0.55,0.3, height 0.56
CAS-220TA [mm] "SWITCH SLIDE DPDT 100MA 6V"
  rrect0% 1x1.6 smd: 1(-1.75,-1.85) 2(0,-1.85) 3(1.75,-1.85) 4(-1.75,1.85) 5(0,1.85) 6(1.75,1.85)
  silkscreen extent -3.3,-2.1 2.7,2.1, body extent -2.7,-2.1 2.7,2.1, height 2.51
CONN_MINIUSB [mm] "USB2.0 Micro-B Receptacle SMD R/A"
  rrect50% 0.4x1.5 smd: 1(-1.3,2.675) 2(-0.65,2.675) 3(0,2.675) 4(0.65,2.675) 5(1.3,2.675)
  rrect50% 2.1x1.6 smd: 6(-3.1,2.55) 7(3.1,2.55)
  rrect50% 1.9x1.8 smd: 8(3.8,0) 9(-3.8,0)
  silkscreen extent -4.14,-1.96 4.11,3.75, body extent -3.96,-2.67 3.96,2.99, height 2.72
"CONN_MOLEX_MINIFIT JR_4 POS_R/A" [mm] "Molex Minifit Jr 5569 4 Pos R/A"
  round 3 hole 1.8: 1(2.1,7.3) 2(-2.1,7.3) 3(2.1,12.8) 4(-2.1,12.8)
  round 3 hole 3 unplated mask+0: ""(0,0)
  silkscreen extent -5.08,-6.73 5.08,6.73, body extent -4.8,-6.5 5.2,13.44, height 11.4
"CONN_MOLEX_MINIFIT JR_6 POS_R/A" [mm] "Molex Minifit Jr 5569 6 Pos R/A"
  round 3 hole 1.801: 1(8.4,7.3) 4(8.4,12.8)
  round 3 hole 1.8: 2(4.2,7.3) 3(0,7.3) 5(4.2,12.8) 6(0,12.8)
  round 3 hole 3 unplated mask+0: ""(0,0) ""(8.4,0)
  silkscreen extent -2.98,-6.86 11.38,6.73, body extent -2.58,-6.6 11.62,13.33, height 11.4
CP-10-9 [mm]
  rect 0.68x0.25 smd: 1(-1.415,1) 2(-1.415,0.5) 3(-1.415,0) 4(-1.415,-0.5) 5(-1.415,-1) 6(1.415,-1) 7(1.415,-0.5) 8(1.415,0) 9(1.415,0.5) 10(1.415,1)
  rect 1.53x2.38 smd: 11(0,0)
  silkscreen extent -2.15,-1.7 1.7,1.75, body extent -1.57,-1.55 1.57,1.55, height 0.8
D2PAK_VIS [mil]
  rect 41x138 smd paste+0 mask+0: 1(-100,-347) 3(100,-347)
  rect 422x474 smd paste+0 mask+0: 2(0,0)
  silkscreen extent -119,-264 120,-250, body extent -210,-402 210,223, height 190
D0008A_M [mm] "SOIC, 8-Leads, Body 5x4mm, Pitch 1.27mm, IPC Low Density"
  rrect15% 1.65x0.65 smd: 1(-2.825,1.905) 2(-2.825,0.635) 3(-2.825,-0.635) 4(-2.825,-1.905) 5(2.825,-1.905) 6(2.825,-0.635) 7(2.825,0.635) 8(2.825,1.905)
  silkscreen extent -2.95,-2.5 1.6,2.9, body extent -3,-2.45 3,2.45, height 1.63
DIODE_0402 [mm]
  rect 0.56x0.6 smd: 1(-0.435,0) 2(0.435,0)
  silkscreen extent -1.02,-0.6 1.02,0.6, body extent -0.5,-0.28 0.5,0.27, height 0.51
FP-ABM11W-MFG [mm]
  rect 0.875x0.775 smd paste+0 mask+0: 1(-0.637,-0.487) 2(0.637,-0.487) 3(0.637,0.487) 4(-0.637,0.487)
  silkscreen extent -1.78,-1.28 1.05,1.28, body extent -1.17,-0.97 1.17,0.97, height 0.25
FP-DQK0006C-MFG [mm]
  rrect33% 0.45x0.3 smd paste+0 mask+0: 1(-0.975,0.65) 2(-0.975,0) 3(-0.975,-0.65) 4(0.975,-0.65) 5(0.975,0) 6(0.975,0.65)
  rrect33% 0.75x0.3 smd paste-1000 mask+0: 7(0.095,-0.65)
  rrect11% 1x0.95 smd paste-1000 mask+0: 8(0,0.325)
  silkscreen extent -1.9,-1.25 1,1.25, body extent -1.3,-1.15 1.3,1.15, height 0.25
FP-ECS-TXO-2520-MFG [mm]
  rect 0.9x0.8 smd paste+0 mask+0: 1(-0.925,-0.725) 2(0.925,-0.725) 3(0.925,0.725) 4(-0.925,0.725)
  silkscreen extent -1.05,-1.8 0.1,1.05, body extent -1.48,-1.22 1.48,1.22, height 0.25
FP-GCM155-0_05-IPC_B [mil]
  rect 24.23x22.54 smd paste+0 mask+0: 1(-16.87,0) 2(16.87,0)
  silkscreen extent -29,-27 29,27, body extent -35,-17 35,17, height 10
FP-S2B-XH-A-1_LF_SN-MFG [mm]
  rect 1.524x1.524 hole 0.9 paste-2539.97 mask+0: 1(1.25,-1.85)
  round 1.524 hole 0.9 paste-2539.97 mask+0: 2(-1.25,-1.85)
  silkscreen extent -3.7,-5.75 4.3,5.75, body extent -3.8,-5.85 3.8,5.85, height 0.25
INDUCTOR_0402 [mm]
  rect 0.56x0.6 smd: 1(-0.435,0) 2(0.435,0)
  silkscreen extent -1.02,-0.6 1.02,0.6, body extent -0.5,-0.28 0.5,0.27, height 0.51
INDUCTOR_0603 [mil] "INDUCTOR 0603"
  rect 30x40 smd: 1(-35,0) 2(35,0)
  silkscreen extent -60,-30 60,30, body extent -31,-16 32,16, height 31
LED_0603 [mil] "LED 0603"
  rect 32x32 smd: 1(-35,0) 2(35,0)
  silkscreen extent -60,-25 60,25, body extent -31,-16 32,16, height 28
LED_0606_4SMD [mm]
  rrect0% 0.8x0.55 smd: 1(-0.8,-0.45) 2(-0.8,0.45) 3(0.8,0.45) 4(0.8,-0.45)
  silkscreen extent -1.22,-1.22 0.8,1.02, body extent -0.8,-0.8 0.8,0.8, height 0.35
LQFP64-10x10mm [mil]
  rect 47x12 smd paste+0 mask+0: 1(-226.38,147.64) 2(-226.38,127.95) 3(-226.38,108.27) 4(-226.38,88.58) 5(-226.38,68.9) 6(-226.38,49.21) 7(-226.38,29.53) 8(-226.38,9.84) 9(-226.38,-9.84) 10(-226.38,-29.53) 11(-226.38,-49.21) 12(-226.38,-68.9) 13(-226.38,-88.58) 14(-226.38,-108.27) 15(-226.38,-127.95) 16(-226.38,-147.64) 33(226.38,-147.64) 34(226.38,-127.95) 35(226.38,-108.27) 36(226.38,-88.58) 37(226.38,-68.9) 38(226.38,-49.21) 39(226.38,-29.53) 40(226.38,-9.84) 41(226.38,9.84) 42(226.38,29.53) 43(226.38,49.21) 44(226.38,68.9) 45(226.38,88.58) 46(226.38,108.27) 47(226.38,127.95) 48(226.38,147.64)
  rect 12x47 smd paste+0 mask+0: 17(-147.64,-226.38) 18(-127.95,-226.38) 19(-108.27,-226.38) 20(-88.58,-226.38) 21(-68.9,-226.38) 22(-49.21,-226.38) 23(-29.53,-226.38) 24(-9.84,-226.38) 25(9.84,-226.38) 26(29.53,-226.38) 27(49.21,-226.38) 28(68.9,-226.38) 29(88.58,-226.38) 30(108.27,-226.38) 31(127.95,-226.38) 32(147.64,-226.38) 49(147.64,226.38) 50(127.95,226.38) 51(108.27,226.38) 52(88.58,226.38) 53(68.9,226.38) 54(49.21,226.38) 55(29.53,226.38) 56(9.84,226.38) 57(-9.84,226.38) 58(-29.53,226.38) 59(-49.21,226.38) 60(-68.9,226.38) 61(-88.58,226.38) 62(-108.27,226.38) 63(-127.95,226.38) 64(-147.64,226.38)
  silkscreen extent -273,-270 270,270, body extent -236,-236 236,236, height 63
LT-MS10_N [mm] "SOP, 10-Leads, Body 3x3mm, Pitch 0.5mm, IPC Medium Density"
  oval 1.6x0.3 smd: 1(-2.125,1) 2(-2.125,0.5) 3(-2.125,0) 4(-2.125,-0.5) 5(-2.125,-1) 6(2.125,-1) 7(2.125,-0.5) 8(2.125,0) 9(2.125,0.5) 10(2.125,1)
  silkscreen extent -2.25,-1.55 0.92,1.82, body extent -1.55,-1.55 1.55,1.55, height 1.1
PWP0016A_N [mm] "SOP, 16-Leads, Body 5.1x4.5mm, Pitch 0.65mm, Thermal Pad 3.1x3mm, IPC Medium Density"
  rrect22% 1.4x0.45 smd: 1(-2.95,2.275) 2(-2.95,1.625) 3(-2.95,0.975) 4(-2.95,0.325) 5(-2.95,-0.325) 6(-2.95,-0.975) 7(-2.95,-1.625) 8(-2.95,-2.275) 9(2.95,-2.275) 10(2.95,-1.625) 11(2.95,-0.975) 12(2.95,-0.325) 13(2.95,0.325) 14(2.95,0.975) 15(2.95,1.625) 16(2.95,2.275)
  rrect3% 3x3 smd: 17(0,0)
  silkscreen extent -3.07,-2.55 1.85,3.17, body extent -3.21,-2.5 3.21,2.5, height 1
"QFN-56 RP2040" [mm] "QFN, 56-Leads, Body 7.00x7.00mm, Pitch 0.40mm, Thermal Pad 3.10x3.10mm, IPC Medium Density"
  oval 0.875x0.2 smd: 1(-3.437,2.6) 2(-3.437,2.2) 3(-3.437,1.8) 4(-3.437,1.4) 5(-3.437,1) 6(-3.437,0.6) 7(-3.437,0.2) 8(-3.437,-0.2) 9(-3.437,-0.6) 10(-3.437,-1) 11(-3.437,-1.4) 12(-3.437,-1.8) 13(-3.437,-2.2) 14(-3.437,-2.6) 29(3.437,-2.6) 30(3.437,-2.2) 31(3.437,-1.8) 32(3.437,-1.4) 33(3.437,-1) 34(3.437,-0.6) 35(3.437,-0.2) 36(3.437,0.2) 37(3.437,0.6) 38(3.437,1) 39(3.437,1.4) 40(3.437,1.8) 41(3.437,2.2) 42(3.437,2.6)
  oval 0.2x0.875 smd: 15(-2.6,-3.437) 16(-2.2,-3.437) 17(-1.8,-3.437) 18(-1.4,-3.437) 19(-1,-3.437) 20(-0.6,-3.437) 21(-0.2,-3.437) 22(0.2,-3.437) 23(0.6,-3.437) 24(1,-3.437) 25(1.4,-3.437) 26(1.8,-3.437) 27(2.2,-3.437) 28(2.6,-3.437) 43(2.6,3.437) 44(2.2,3.437) 45(1.8,3.437) 46(1.4,3.437) 47(1,3.437) 48(0.6,3.437) 49(0.2,3.437) 50(-0.2,3.437) 51(-0.6,3.437) 52(-1,3.437) 53(-1.4,3.437) 54(-1.8,3.437) 55(-2.2,3.437) 56(-2.6,3.437)
  rect 3.2x3.2 smd: 57(0,0)
  silkscreen extent -4.19,-3.65 3.65,3.65, body extent -3.52,-3.52 3.52,3.52, height 0.85
RESC1005X40X25ML05T05 [mm] "Chip Resistor, 2-Leads, Body 1.00x0.50mm, IPC Low Density"
  rect 0.65x0.65 smd: 1(-0.5,0) 2(0.5,0)
  body extent -0.53,-0.27 0.53,0.28, height 0.4
RESC2512(6432)_L [mm] "Chip Resistor, Body 6.4x3.2mm, IPC High Density"
  rect 1.05x3.25 smd: 1(-2.9,0) 2(2.9,0)
  silkscreen extent -2,-1.52 2,1.53, body extent -3.25,-1.7 3.25,1.7, height 0.75
RESISTOR_0402 [mm] "Resistor 0402"
  rect 0.55x0.75 smd: 1(-0.475,0) 2(0.475,0)
  silkscreen extent -1.02,-0.64 1.02,0.64, body extent -0.5,-0.25 0.5,0.25, height 0.25
RESISTOR_0603 [mil] "Resistor 0603"
  rect 40x45 smd: 1(-33.5,0) 2(33.5,0)
  silkscreen extent -65,-35 65,35, body extent -31,-16 32,16, height 16
SMD_434123025826 [mm]
  rect 1.05x0.65 smd: A1(-2.075,1.075) A2(2.075,1.075) B1(-2.075,-1.075) B2(2.075,-1.075)
  silkscreen extent -2.1,-1.6 2.1,1.6, body extent -2.3,-1.6 2.3,1.6, height 2.5
SOIC-8 [mm] "SOIC, 8-Leads, Body 4.90x3.90mm, Pitch 1.27mm, IPC Medium Density"
  oval 1.45x0.6 smd: 1(-2.725,1.905) 2(-2.725,0.635) 3(-2.725,-0.635) 4(-2.725,-1.905) 5(2.725,-1.905) 6(2.725,-0.635) 7(2.725,0.635) 8(2.725,1.905)
  silkscreen extent -2.85,-2.5 1.6,2.88, body extent -3,-2.5 3,2.5, height 1.75
"SOIC-8 W25QxJV" [mm] "SOIC, 8-Leads, Body 5.28x5.28mm, Pitch 1.27mm, IPC Medium Density"
  oval 1.7x0.6 smd: 1(-3.55,1.905) 2(-3.55,0.635) 3(-3.55,-0.635) 4(-3.55,-1.905) 5(3.55,-1.905) 6(3.55,-0.635) 7(3.55,0.635) 8(3.55,1.905)
  silkscreen extent -3.67,-2.7 2.3,2.88, body extent -3.95,-2.62 3.95,2.62, height 1.95
SOIC-14 [mm] "SOIC, 14-Leads, Body 8.65x3.90mm, Pitch 1.27mm, IPC Medium Density"
  oval 1.45x0.6 smd: 1(-2.725,3.81) 2(-2.725,2.54) 3(-2.725,1.27) 4(-2.725,0) 5(-2.725,-1.27) 6(-2.725,-2.54) 7(-2.725,-3.81) 8(2.725,-3.81) 9(2.725,-2.54) 10(2.725,-1.27) 11(2.725,0) 12(2.725,1.27) 13(2.725,2.54) 14(2.725,3.81)
  silkscreen extent -2.85,-4.35 1.6,4.78, body extent -3,-4.4 3,4.4, height 1.7
SOT-23-3 [mil]
  rect 22x50 smd paste+0 mask+4: 1(-37.5,-41) 2(37.5,-41) 3(0,41)
  silkscreen extent -65,-33 65,33, body extent -60,-52 60,52, height 44
SOT-223-4 [mm]
  rect 2.05x1 smd paste+0 mask+0.102: 1(-3.175,2.3) 2(-3.175,0) 3(-3.175,-2.3)
  rect 2.05x3.25 smd paste+0 mask+0.102: 4(3.175,0)
  silkscreen extent -1.96,-3.35 1.3,3.35, body extent -3.5,-3.25 3.5,3.25, height 1.68
"SS-12D07-VG 4 NS GA PA" [mil]
  rect 56x56 / inner round 60 / far side rect 56x56 hole 32 paste-99999 mask+0: 1(0,0)
  round 58 / inner round 60 / far side round 58 hole 32 paste-99999 mask+0: 2(0,-78.74)
  round 56 / inner round 60 / far side round 56 hole 32 paste-99999 mask+0: 3(0,-157.48)
  round 73 hole 49 unplated paste-99999 mask-24.5: 4(0,82.68) 5(0,-240.16)
  silkscreen extent -90,-253 90,96
STM32_Connector [mil]
  round 65 hole 40 paste-99999 mask+0: 1(-450,-50) 2(-450,50) 3(-350,-50) 4(-350,50) 5(-250,-50) 6(-250,50) 7(-150,-50) 8(-150,50) 9(-50,-50) 10(-50,50) 11(50,-50) 12(50,50) 13(150,-50) 14(150,50) 15(250,-50) 16(250,50) 17(350,-50) 18(350,50) 19(450,-50) 20(450,50)
  silkscreen extent -655,-178 655,188
TC2030-MCP [mil]
  round 31 smd: 1(50,-25) 2(50,25) 3(100,-25) 4(100,25) 5(150,-25) 6(150,25)
  round 34 hole 35 unplated: A(0,0) B(200,40) C(200,-40)
  round 92 hole 93 unplated: D(0,-100) E(125,-100) F(0,100) G(125,100)
  silkscreen extent -55,-155 225,155
TESTPOINT_1.2MM [mm]
  round 1.2 smd: TP(0,0)
TRIM_TC33X-2-203E [mm]
  rect 1.2x1.2 smd: 1(-1.8,1) 3(-1.8,-1)
  rect 1.5x1.6 smd: 2(1.45,0)
  silkscreen extent -3.07,-1.8 1.8,1.8, body extent -1.9,-1.5 1.9,1.5, height 1.1

## Part data
"ADC L" "ADC R" TP1 TP2 TP3 TP4 TP5 TP6 TP7 TP8 TP9 TP10 TP11 TP13 TP14 TP15 TP17 TP19: library part TESTPOINT, Made By="Robert Pafford"
C1 C2 C3 C4: library part CAPACITOR_0.000027uF_0603, "Cap 27pF 50V +/-5% / Ceramic 0603", Supplier Part Number 1=311-1063-1-ND, Tolerance="+/- 5%", Voltage=50V, ComponentLink1Description=Datsheet, ComponentLink1URL=https://www.mouser.com/datasheet/2/212/KEM_C1002_X7R_SMD-1102033.pdf, Made By="Flip B", Supplier 1=Digi-Key
C1C C3C C3R C4C C5R C6R C7R C8R C9R C10R C12R C13R C41 C42: library part CAPACITOR_0.1uF_0402, "Cap 100nF 25V +/-10% / Ceramic 0402", Supplier Part Number 1=478-7868-1-ND, Tolerance="+/- 10%", Voltage=25V, Made By="Robert Pafford", Supplier 1=Digi-Key
C1R C2R: library part CAPACITOR_0.000027uF_0402, "Cap 27pF 50V +/-5% / Ceramic 0402", Supplier Part Number 1=445-5589-1-ND, Tolerance="+/- 5%", Voltage=50V, Made By="Robert Pafford", Supplier 1=Digi-Key
C2C C72: library part CAPACITOR_0.0047uF_0402, "4700 pF +/-10% 25V Ceramic Capacitor X7R 0402", Supplier Part Number 1=478-6195-1-ND, Tolerance="+/- 10%", Voltage=25V, Made By="Robert Pafford", Supplier 1=Digi-Key
C4R C5C C11R C25 C27 C44 C71: library part CAPACITOR_1uF_0402, "Cap 1uF 16V +/-10% / Ceramic 0402", Supplier Part Number 1=478-0402YD105KAT4ADKR-ND, Tolerance="+/- 10%", Voltage=16V, Made By="Robert Pafford", Supplier 1=Digi-Key
C5 C6 C31 C33 C36 C37: library part CAPACITOR_10uF_0603, "Cap 10uF 6.3V +/-20% / Ceramic 0603", Supplier Part Number 1=1276-1119-1-ND, Tolerance="+/- 20%", Value (uF)="10 uF", Voltage=6.3V, ComponentLink1Description=Digikey, ComponentLink1URL=https://www.digikey.com/en/products/detail/samsung-electro-mechanics/CL10A106MQ8NNNC/3886777, Made By="Flip B", Supplier 1=Digi-Key
C7 C9: library part CAPACITOR_1uF_0402, "Cap 1uF 16V +/-10% / Ceramic 0402", Supplier Part Number 1=445-9097-1-ND, Tolerance="+/- 10%", Voltage=16V, Made By="Robert Pafford", Supplier 1=Digikey
C8 C10: library part CAPACITOR_1uF_0402, "Cap 1uF 16V +/-10% / Ceramic 0402", Supplier Part Number 1=399-C0402C104K8PACTUCT-ND, Tolerance="+/- 10%", Voltage=16V, Made By="Robert Pafford", Supplier 1=Digikey
C11: library part CAPACITOR_1uF_0402, "Cap 1uF 16V +/-10% / Ceramic 0402", Supplier Part Number 1=311-1031-1-ND, Tolerance="+/- 10%", Voltage=16V, Made By="Robert Pafford", Supplier 1=Digikey
C12: library part CAPACITOR_1uF_0402, "Cap 1uF 16V +/-10% / Ceramic 0402", Supplier Part Number 1=311-3805-1-ND, Tolerance="+/- 10%", Voltage=16V, Made By="Robert Pafford", Supplier 1=Digikey
C13: library part CAPACITOR_1uF_0402, "Cap 1uF 16V +/-10% / Ceramic 0402", Supplier Part Number 1=490-3253-1-ND, Tolerance="+/- 10%", Voltage=16V, Made By="Robert Pafford", Supplier 1=Digikey
C14: library part CAPACITOR_1uF_0402, "Cap 1uF 16V +/-10% / Ceramic 0402", Supplier Part Number 1=399-C0402C105K8PACTUCT-ND, Tolerance="+/- 10%", Voltage=16V, Made By="Robert Pafford", Supplier 1=Digikey
C15: library part CAPACITOR_1uF_0402, "Cap 1uF 16V +/-10% / Ceramic 0402", Supplier Part Number 1=399-C0402C110J5GACTUCT-ND, Tolerance="+/- 10%", Voltage=16V, Made By="Robert Pafford", Supplier 1=Digikey
C16: library part CAPACITOR_1uF_0402, "Cap 1uF 16V +/-10% / Ceramic 0402", Supplier Part Number 1=311-1722-1-ND, Tolerance="+/- 10%", Voltage=16V, Made By="Robert Pafford", Supplier 1=Digikey
C17: library part CAPACITOR_1uF_0402, "Cap 1uF 16V +/-10% / Ceramic 0402", Supplier Part Number 1=490-GCM1555C1H820JA16DCT-ND, Tolerance="+/- 10%", Voltage=16V, Made By="Robert Pafford", Supplier 1=Digikey
C18 C20 C21: library part CAPACITOR_10uF_1206_Tantalum_1, "Cap 10uF 16V +/-20% / Tantalum 1206", Supplier Part Number 1=478-5800-1-ND, Tolerance="+/- 10%", Value (uF)="47 uF", Voltage=16V, ComponentLink1Description=Digikey, ComponentLink1URL=https://www.digikey.com/en/products/detail/kyocera-avx/F981A106MMA/4004990, Made By="Dylan T", Supplier 1=Digikey
C19: library part CAPACITOR_1uF_0402, "Cap 1uF 16V +/-10% / Ceramic 0402", Supplier Part Number 1=445-13820-1-ND, Tolerance="+/- 10%", Voltage=16V, Made By="Robert Pafford", Supplier 1=Digikey
C22 C26 C34 C35 C38 C39: library part CAPACITOR_0.1uF_0402, "Cap 100nF 25V +/-10% / Ceramic 0402", Supplier Part Number 1=7029569, Tolerance="+/- 10%", Voltage=25V, Made By="Robert Pafford", Supplier 1="Future Electronics"
C28: library part CAPACITOR_0.01uF_0603, "Cap 10nF 6.3V +/-20% / Ceramic 0603", Supplier Part Number 1=80-C0603C103K9R, Tolerance="+/- 10%", Voltage=6.3V, ComponentLink1Description=Datsheet, ComponentLink1URL=https://www.mouser.com/datasheet/2/212/KEM_C1002_X7R_SMD-1102033.pdf, Made By="Flip B", Supplier 1=Mouser
C29 C30: library part CAPACITOR_0.1uF_0603, "Cap 100nF 6.3V +/-10% / Ceramic 0603", Supplier Part Number 1=399-15351-1-ND, Tolerance="+/- 10%", Voltage=6.3V, ComponentLink1Description=Datsheet, ComponentLink1URL=https://www.mouser.com/datasheet/2/212/KEM_C1002_X7R_SMD-1102033.pdf, Made By="Flip B", Supplier 1=Digi-Key
C32: library part CAPACITOR_0.01uF_0603_50V, "10000 pF ±10% 50V Ceramic Capacitor X7R 0603 (1608 Metric)", Tolerance="+/- 10%", Voltage=6.3V, ComponentLink1Description=Datsheet, ComponentLink1URL=https://www.mouser.com/datasheet/2/212/KEM_C1002_X7R_SMD-1102033.pdf, Made By="Flip B", Supplier 1="Arrow Electronics", Supplier Part Number 1=CL10B103KB8NNNC
C40 C43: library part CAPACITOR_4.7uF_0603, "Cap 4.7uF 6.3V +/-10% / Ceramic 0603", Supplier Part Number 1=1276-2087-1-ND, Tolerance="+/- 10%", Voltage=6.3V, Made By="Robert Pafford", Supplier 1=Digi-Key
C65 C67: library part CMP-06035-004581-1, "Ceramic Capacitor for Automotive 11pF ±1% 50VDC C0G 0402 Paper T/R"
C66 C68: library part CMP-2100-03589-1, "Chip Capacitor, 10 pF, +/- 5%, 50 V, -55 to 125 degC, 0402 (1005 Metric), RoHS, Tape and Reel", Capacitance=10pF, Case Code (Imperial)=0402, Case Code (Metric)=1005, Dielectric=C0G, Dielectric Material=Ceramic, Insulation Resistance=100GR, Manufacturer=Yageo, Max Operating Temperature=125degC, Min Operating Temperature=-55degC, Package Description="2-Pin Surface Mount Device, Body 1 x 0.5 mm", Package Quantity=1, Temperature Coefficient=30ppm/degC, Tolerance=5%, Voltage=50V, Case/Package=0402, Composition=Ceramic, Datasheet URL=http://www.yageo.com/documents/recent/UPY-GP_NP0_16V-to-50V_14.pdf, Datasheet Version="Rev. 14, 07/2016", Depth=0.5mm, Height=0.5mm, Lead Free=LeadFree, Length=1mm, Manufacturer URL=http://www.yageo.com/, Mount=SurfaceMount, Number of Pins=2, Package Reference=0402, Packaging=TapeandReel, Radiation Hardening=No, REACH SVHC=NoSVHC, RoHSCompliant=True, Termination=SMD/SMT, Thickness=0.022inch, Voltage Rating=50V, Voltage Rating (DC)=50V, Width=0.02inch
C69 C70: library part CMP-2008-02683-1, Manufacturer="AVX Interconnect / Elco", Part Number=04025A7R0CAT2A
CR1: "No Description Available", Mfr_Name=Vishay, Supplier Part Number 1=VS-50WQ04FN-M3-ND, RefDes=RefDes, Supplier 1=Digikey, Type=Type
D1 D2: library part "RF Diode 80V 100mA", "RF Diode PIN - Single 80V 100 mA 250 mW PG-TSLP-2-19", Forward Current=100mA, Package=0402, Voltage - Peak Reverse=80V
D1C D7: library part LED_RGB_4SMD, "LED RGB CLEAR 4SMD", Blue Forward Current=5mA, Blue Forward Voltage=2.8V, Color=RGB, Package=4-SMD, Red Forward Voltage=1.8V, Supplier Part Number 1=1080-1552-1-ND, ComponentLink1Description=Datasheet, ComponentLink1URL=https://everlightamericas.com/index.php?controller=attachment&id_attachment=3220, Green Forward Current=5mA, Green Forward Voltage=2.8V, Made By="Robert Pafford", Red Forward Current=5mA, Supplier 1=Digi-Key
D3 D4 D5 D6 D8 D9: library part LED_Green_0603_3V, "LED Green Vf= 3V If = 0.005A / IN-S63AT5G", Color=Green, Forward Current=5mA, Forward Voltage=3V, Package=0603, Supplier Part Number 1=1830-1062-1-ND, ComponentLink1Description=Datasheet, ComponentLink1URL=https://www.we-online.de/katalog/datasheet/150060GS75000.pdf, Made By="Robert Pafford", Supplier 1=Digi-Key
DNP0 DNP1 DNP2 DNP3 DNP7 DNP8 DNP9 DNP10 DNP11 DNP12 DNP13 DNP14 DNP15 DNP16 DNP17 DNP18 DNP19 DNP20 DNP21 DNP22 DNP23 DNP24 DNP25 DNP26 DNP27 DNP28: library part DNP_0402, "Do Not Populate 0402"
J1: library part "CONN_MOLEX_MINIFIT JR_6POS_R/A", "Molex Minifit Jr. 5569  / 6 Pos R/A Natural", Color=Natural, Current Per Pin=13A, Manufacturer=Molex, Supplier Part Number 1=WM1353-ND, ComponentLink1Description=Datasheet, ComponentLink1URL=https://www.molex.com/pdm_docs/ps/PS-5556-001.pdf, Configuration="Right Angle", Created By="Flip B", Number of Positions=8, Pitch=4.2mm, Series="Minifit Jr 5569", Supplier 1=Digi-Key
J1R: library part TC2030_SWD, "TagConnect TC2030 ARM SWD 6-pin"
J2 J3 J4 J5: library part "CONN_MOLEX_MINIFIT JR_4POS_R/A", "Molex Minifit Jr. 5569  / 4 Pos R/A Natural", Color=Natural, Current Per Pin=13A, Manufacturer=Molex, Supplier Part Number 1=WM13112-ND, ComponentLink1Description=Datasheet, ComponentLink1URL=https://www.molex.com/pdm_docs/sd/026013115_sd.pdf, Configuration="Right Angle", Created By="Flip B", Number of Positions=4, Pitch=4.2mm, Series="Minifit Jr 5569", Supplier 1=Digi-Key
J6: library part CONN_MICROUSB, "Amphenol Micro USB-B / USB2.0 5 Pin Right Angle SMD", Color=Silver, Current Per Pin=1.8A, Manufacturer=Amphenol, Supplier Part Number 1=609-4613-1-ND, ComponentLink1Description=Datasheet, ComponentLink1URL=https://cdn.amphenol-icc.com/media/wysiwyg/files/documentation/datasheet/inputoutput/io_usb_micro.pdf?__cf_chl_jschl_tk__=05693735e19256298f6ef6ca2bb2e65c376a4f56-1625503833-0-Abitsb0-ufjOXJYs_S3J3r2iTn-nObalbmXUksF1VvO_h_WEmRdMlUD1I8-hmWSEVWzY1pirKnrPZWfgY3851qyBZe5ZvnNQePLGIzUgdEIQBVUyW36RsbYpDLEWxJ4horD-5gChFgobLYqwmG5aHl0E8lIn_twwPPrOxilK2gP0q9t_CNOs_u5fMqXvXUrlsOv8tIE2NRlu6NVP8qtkL2GjhlkeTUbDMF8WvvpPDTFOgvZ4Y16Ej8F8AhWos88mo5B1HssXozw0XrkJQIqERITUu6rqloz9kf4ZzhBHtDAt-IkiAFY_Ds9SW8FYKKTtINJVpHZQ6Gyu1FFM4Dc9MO0maE8_mmNcwlxqyRoRk_MPWW8VyByXWM5RSp52jteRKw7FeI9WIYvCbPAOy0Eyib-aseIQsnGbglBcUY6_2xp8GYaJM38H3dNvBPsSOfJBPndKedwKHllxjkucXn6xsN0sDXkpGN-cu8_2bDTJ0g-uUucKSCooYX-ApSDNGpkA_p9zv1SOAD8c0zaZVmtiBsN75QpVz2rzq9_BFxOywPvR, Configuration="Right Angle", Created By="Flip B", Number of Positions=5, Pitch=0.65mm, Series=10118192, Supplier 1=Digi-Key
J7: library part 302-S201, Supplier Part Number 1=ED10524-ND, Supplier 1=Digikey
J8: library part CMP-17439-000260-1, "CONN HEADER R/A 2POS 2.5MM", Flammability Rating="UL94 V-0", Insulation Color=Natural, Max Operating Temperature=85°C, Min Operating Temperature=-25°C, Voltage Rating=250V, Connector Type=Header, Contact Finish - Mating=TIN, Contact Material=Brass, Contact Shape=Square, Contact Type="Male Pin", Fastening Type=Detent, Insulation Material=Nylon, Lead Free="Lead Free", Mount="Through Hole", Number of Positions=2, Number of Rows=1, Packaging=Bulk, Series=XH, Termination=Press-Fit
L1 L2 L3 L4: library part INDUCTOR_12uH_0603, "12 µH Shielded Multilayer Inductor 10 mA 1.8Ohm Max 0603 (1608 Metric)", Current Rating=2.1A, DC Resistance=36mOhm, Supplier Part Number 1=MLF1608E120JTD25, Tolerance="+/- 20%", Made By="Robert Pafford", Supplier 1="Arrow Electronics"
L5: library part INDUCTOR_15nH_0402, "15 nH Unshielded Multilayer Inductor 250 mA 600mOhm Max 0402 (1005 Metric)", Supplier Part Number 1=445-6381-1-ND, Tolerance="+/- 5%", Supplier 1=Digikey
Q1: library part CMP-04962-000051-1, "MOSFET N-CH 20V 22A 6SON", Continuous Drain Current (ID)=22A, Drain to Source Breakdown Voltage=20V, Drain to Source Resistance=19.2mR, Input Capacitance=419pF, Max Operating Temperature=150°C, Max Power Dissipation=2.5W, Min Operating Temperature=-55°C, Package Quantity=3000, Contact Plating=Tin, Drain to Source Voltage (Vdss)=20V, Element Configuration=Single, Fall Time=4.1ns, Gate to Source Voltage (Vgs)=20V, Lead Free="Lead Free", Mount="Surface Mount", Number of Channels=1, Number of Elements=2, Number of Pins=6, Packaging="Tape and Reel", Power Dissipation=2.5W, Rds On Max=15mR, Rise Time=17.2ns, Turn-Off Delay Time=9.9ns, Turn-On Delay Time=17.2ns
Q2: library part TSM500P02CX, "P-Channel 20 V 4.7A (Tc) 1.56W (Tc) Surface Mount SOT-23", Amp Rating="4.7 A", Package="TO-236-3, SC-59, SOT-23-3", Power Dissipation="1.56W (Tc)", Supplier Part Number 1=TSM500P02CXRFGCT-ND, Created By="Robert Pafford", FET Type=P-Channel, Manufacturer_Part_Number=TSM500P02CX, Rds (on)="50mOhm @ 3A, 4.5V", Supplier 1=Digi-Key, Vdss="20 V", Vendor="Taiwan Semiconductor Corporation", Vgs (Max)=±10V, Vgs (th)="800mV @ 250µA"
R1 R2 R3 R4 R23 R27: library part RESISTOR_1K_0603, "RES 1k OHM 5% 1/8W 0603", Digikey Part Numer=CR0603-JW-104ELFTR-ND, Supplier Part Number 1=2019-RK73B1JTTD102JCT-ND, Tolerance="+/- 5%", Value  (Ohms)=1K, ComponentLink1Description=Datasheet, ComponentLink1URL=https://www.bourns.com/docs/product-datasheets/CRxxxxx.pdf, Made By="Robert Pafford", Supplier=Digikey, Supplier 1=Digi-Key, Wattage=1/8W
R1C R4C R4R R5R R6C R41 R42: library part RESISTOR_10K_0402, "RES 10k OHM 1% 1/16W 0402", Digikey Part Numer=CR0603-JW-104ELFTR-ND, Supplier Part Number 1=YAG3436CT-ND, Tolerance="+/- 1%", Value  (Ohms)=10K, Made By="Robert Pafford", Supplier=Digikey, Supplier 1=Digi-Key, Wattage=1/16W
R1R R6R R7R R8 R31: library part RESISTOR_1K_0402, "RES 1k OHM 1% 1/16W 0402", Digikey Part Numer=CR0603-JW-104ELFTR-ND, Supplier Part Number 1=13-AC0402FR-131KLCT-ND, Tolerance="+/- 1%", Value  (Ohms)=1K, Made By="Robert Pafford", Supplier=Digikey, Supplier 1=Digi-Key, Wattage=1/16W
R2C R3C R44 R46: library part RESISTOR_60.4_0402, "RES 60.4 OHM 1% 1/16W 0402", Digikey Part Numer=CR0603-JW-104ELFTR-ND, Supplier Part Number 1=13-AC0402FR-0760R4LCT-ND, Tolerance="+/- 1%", Value  (Ohms)=60.4, Made By="Robert Pafford", Supplier=Digikey, Supplier 1=Digi-Key, Wattage=1/16W
R2R R3R: library part RESISTOR_27_0402, "RES 27 OHM 1% 1/16W 0402", Digikey Part Numer=CR0603-JW-104ELFTR-ND, Supplier Part Number 1=YAG5278DKR-ND, Tolerance="+/- 1%", Value  (Ohms)=27, Made By="Robert Pafford", Supplier=Digikey, Supplier 1=Digi-Key, Wattage=1/16W
R5 R6 R7: "20 kOhms 0.1W, 1/10W J Lead Surface Mount Trimmer Potentiometer Cermet 1 Turn Top Adjustment", Package="1608 Bourns", Supplier Part Number 1=652-TC33X-2-203E, Check_prices=https://www.snapeda.com/parts/TC33X-2-203E/Bourns/view-part/312812/?ref=eda, Digi-Key_Part_Number=TC33X-2-203ECT-ND, MF=Bourns, MP=TC33X-2-203E, Purchase-URL=https://pricing.snapeda.com/search/part/TC33X-2-203E/?ref=eda, SnapEDA_Link=https://www.snapeda.com/parts/TC33X-2-203E/Bourns/view-part/312812/?ref=snap, Supplier 1=Mouser
R5C R43: library part RESISTOR_604_0402, "RES 604 OHM 1% 1/16W 0402", Digikey Part Numer=CR0603-JW-104ELFTR-ND, Supplier Part Number 1=13-AC0402FR-07604RLCT-ND, Tolerance="+/- 1%", Value  (Ohms)=604, Made By="Robert Pafford", Supplier=Digikey, Supplier 1=Digi-Key, Wattage=1/16W
R7C R8C R45 R47: library part RESISTOR_200_0402, "RES 200 OHM 1% 1/16W 0402", Digikey Part Numer=CR0603-JW-104ELFTR-ND, Supplier Part Number 1=YAG3453CT-ND, Tolerance="+/- 1%", Value  (Ohms)=200, Made By="Robert Pafford", Supplier=Digikey, Supplier 1=Digi-Key, Wattage=1/16W
R9 R10: library part RESISTOR_10K_0.5%_0603, "RES 10k OHM 0.5% 1/10W 0603", Digikey Part Numer=CR0603-JW-104ELFTR-ND, Supplier Part Number 1=749-1695-1-ND, Tolerance="+/- 0.5%", Value  (Ohms)=10K, Made By="Robert Pafford", Supplier=Digikey, Supplier 1=Digi-Key, Wattage=1/10W
R11 R12 R26 R38 R39 R40: library part RESISTOR_10K_0603, "RES 10k OHM 5% 1/10W 0603", Digikey Part Numer=CR0603-JW-104ELFTR-ND, Supplier Part Number 1=2019-RK73B1JTTD103JCT-ND, Tolerance="+/- 5%", Value  (Ohms)=10K, ComponentLink1Description=Datasheet, ComponentLink1URL=https://www.bourns.com/docs/product-datasheets/CRxxxxx.pdf, Made By="Robert Pafford", Supplier=Digikey, Supplier 1=Digi-Key, Wattage=1/8W
R13 R14: library part TC33X-2-203E, "20 kOhms 0.1W, 1/10W J Lead Surface Mount Trimmer Potentiometer Cermet 1 Turn Top Adjustment", Package="1608 Bourns", Supplier Part Number 1=652-TC33X-2-203E, Check_prices=https://www.snapeda.com/parts/TC33X-2-203E/Bourns/view-part/312812/?ref=eda, Digi-Key_Part_Number=TC33X-2-203ECT-ND, MF=Bourns, MP=TC33X-2-203E, Purchase-URL=https://pricing.snapeda.com/search/part/TC33X-2-203E/?ref=eda, SnapEDA_Link=https://www.snapeda.com/parts/TC33X-2-203E/Bourns/view-part/312812/?ref=snap, Supplier 1=Mouser
R15 R20: library part RESISTOR_1K_0402, "RES 1k OHM 1% 1/16W 0402", Digikey Part Numer=CR0603-JW-104ELFTR-ND, Supplier Part Number 1=P10.0KLCT-ND, Tolerance="+/- 1%", Value  (Ohms)=10K, Made By="Robert Pafford", Supplier=Digikey, Supplier 1=Digikey, Wattage=1/16W
R16: library part RESISTOR_1K_0402, "RES 1k OHM 1% 1/16W 0402", Digikey Part Numer=CR0603-JW-104ELFTR-ND, Supplier Part Number 1=YAG3150CT-ND, Tolerance="+/- 1%", Value  (Ohms)=3.57K, Made By="Robert Pafford", Supplier=Digikey, Supplier 1=Digikey, Wattage=1/16W